# Altium PCB Fast_Servo.PCBDOC (part 1 of 11)
Units mm, origin at the board's own origin, x right, y up, seen from the top; angles counter-clockwise.
Board outline 162.48 x 100 mm, 6 copper layers (Top, GP1(GND), L3, L4, P3V3, Bot), stack 1.716 mm thick; 668 components, 491 nets, 2308 pads, 1133 vias.
Unrouted connection lines stored in the file: 2.
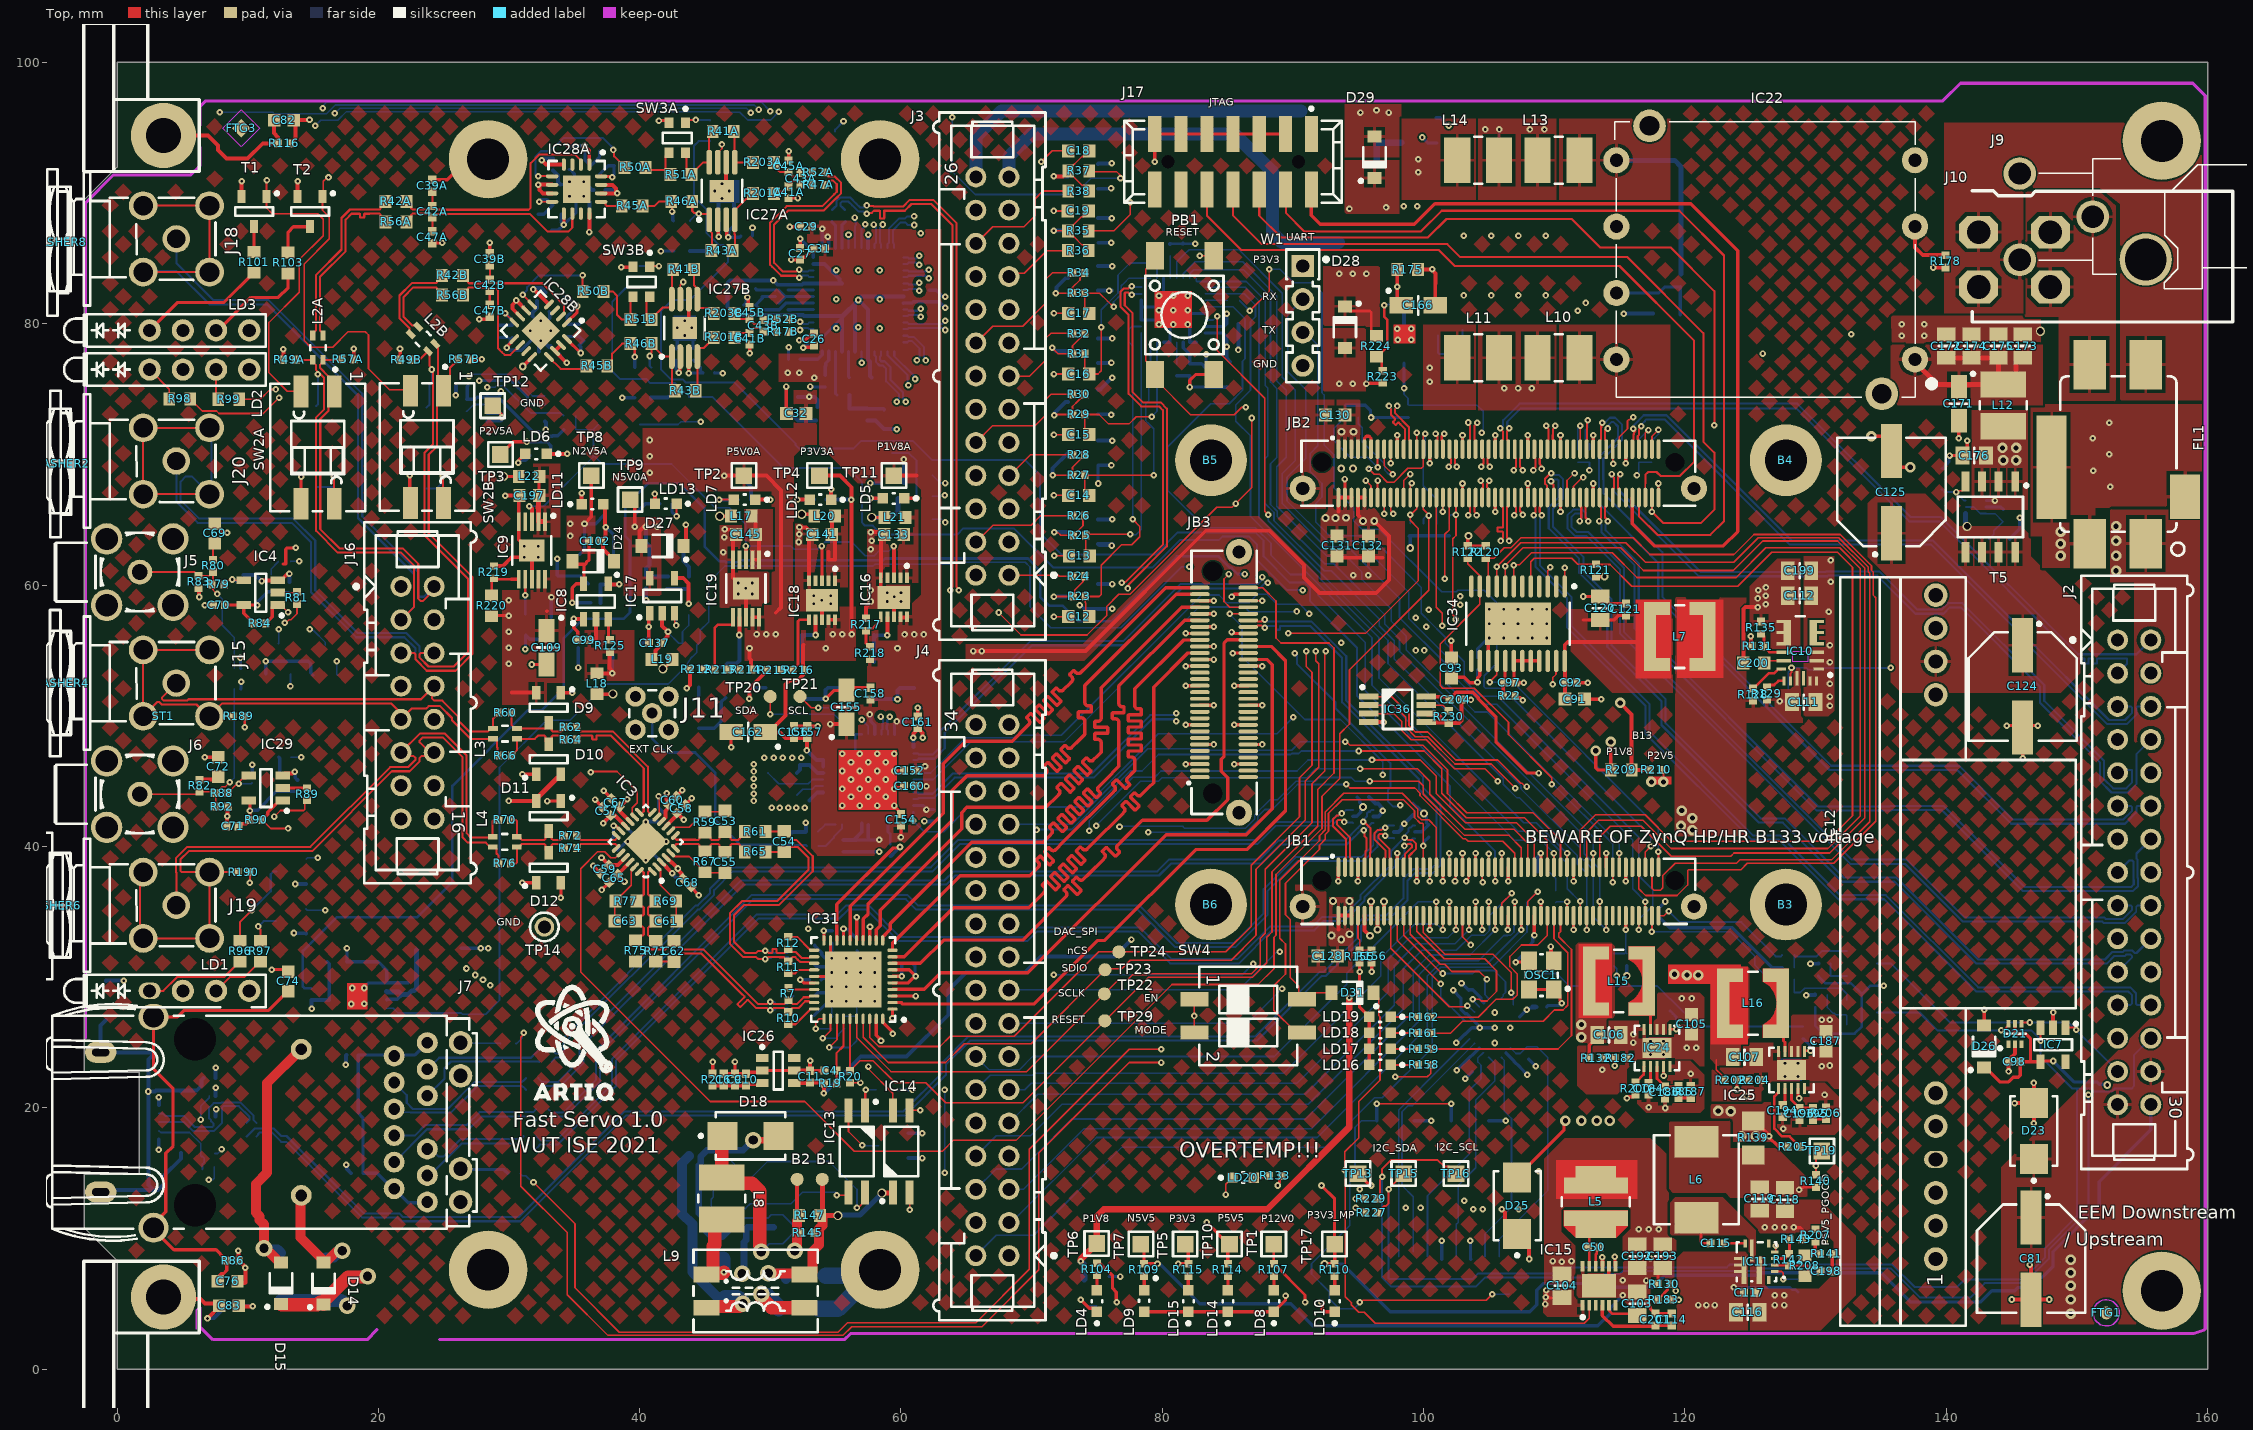
[diagram p0: Top view]
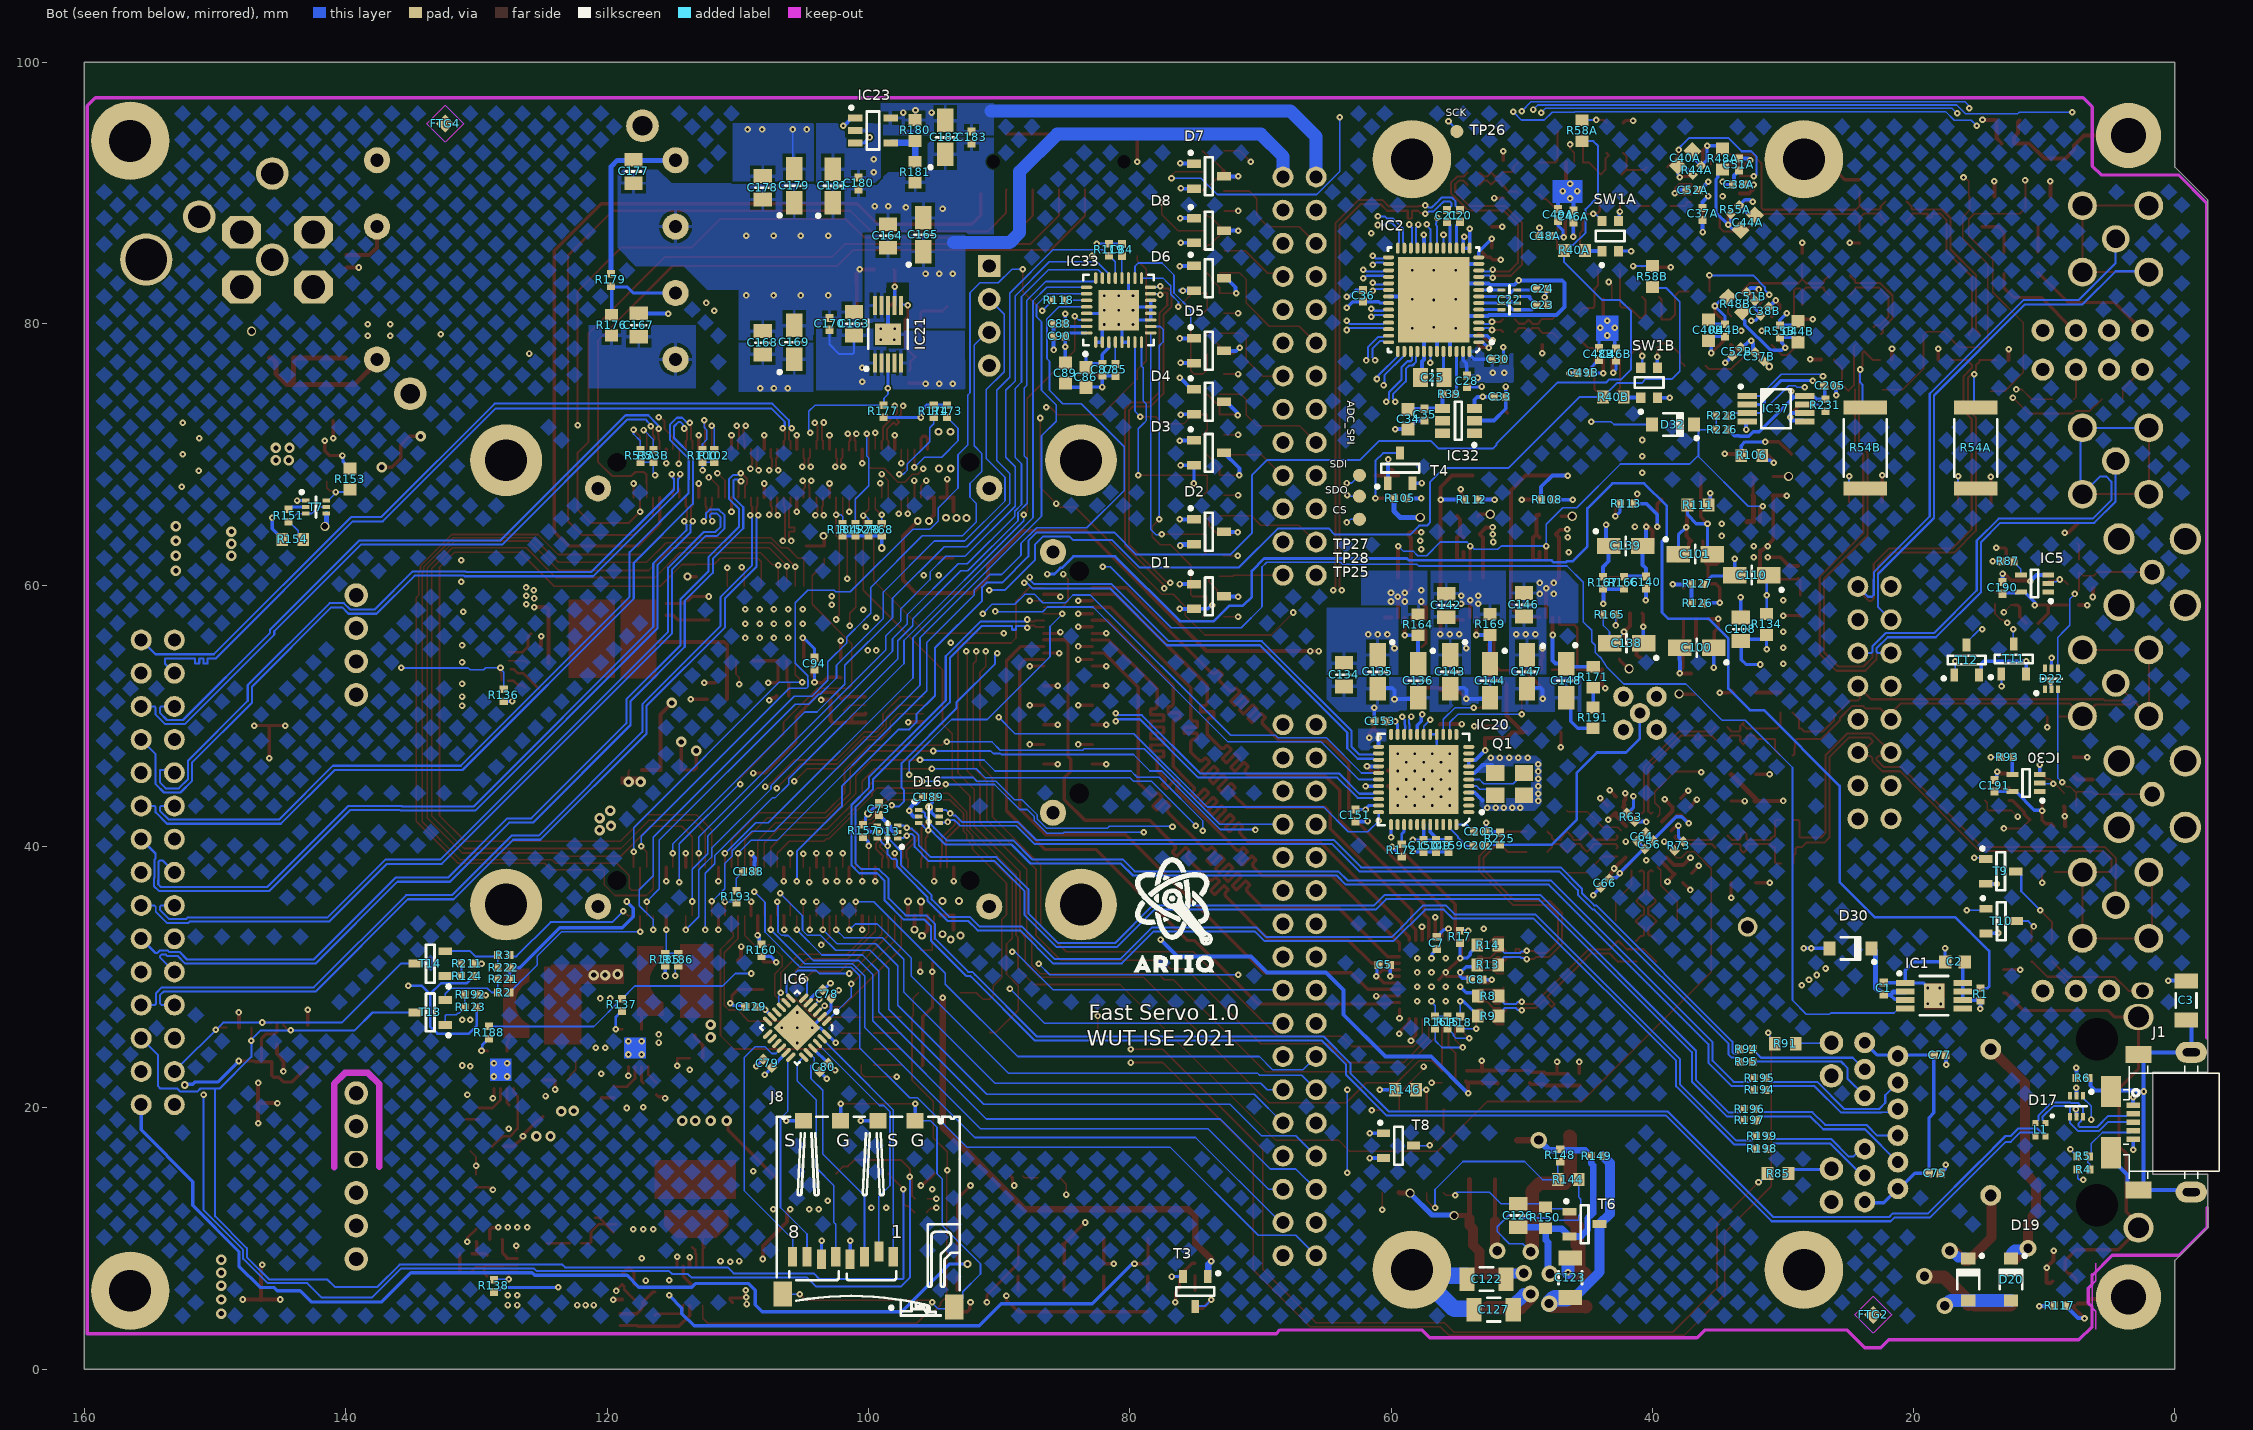
[diagram p1: Bot view, seen from below]
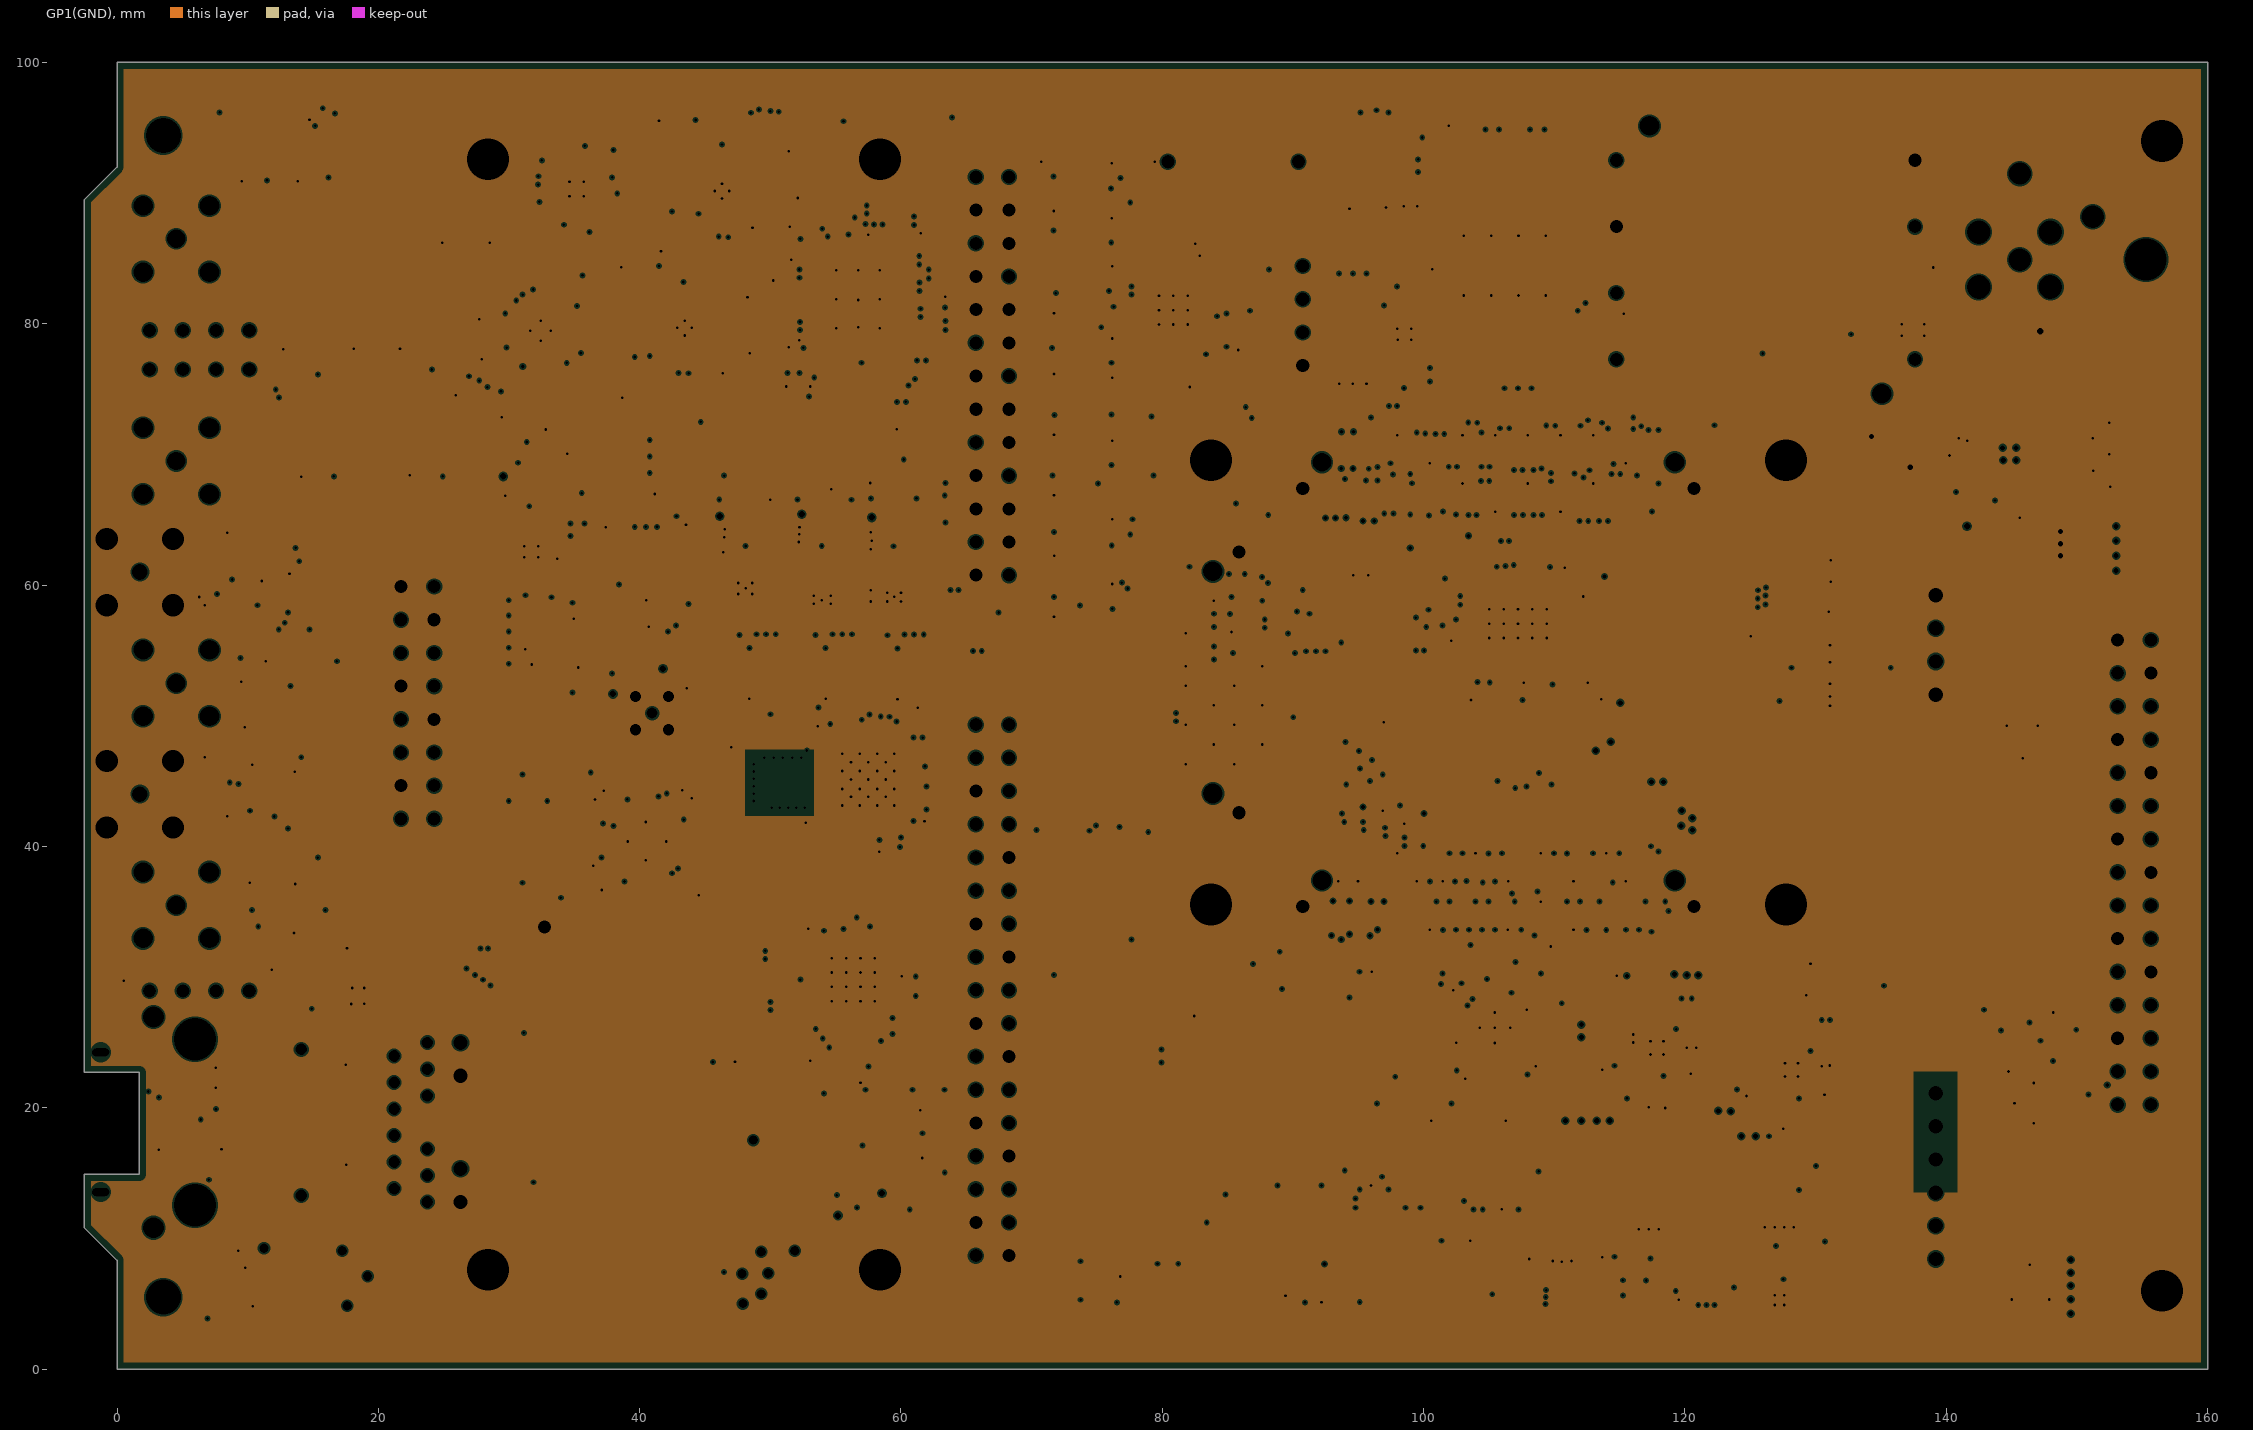
[diagram p2: GP1(GND), clearances drawn from the general rule]
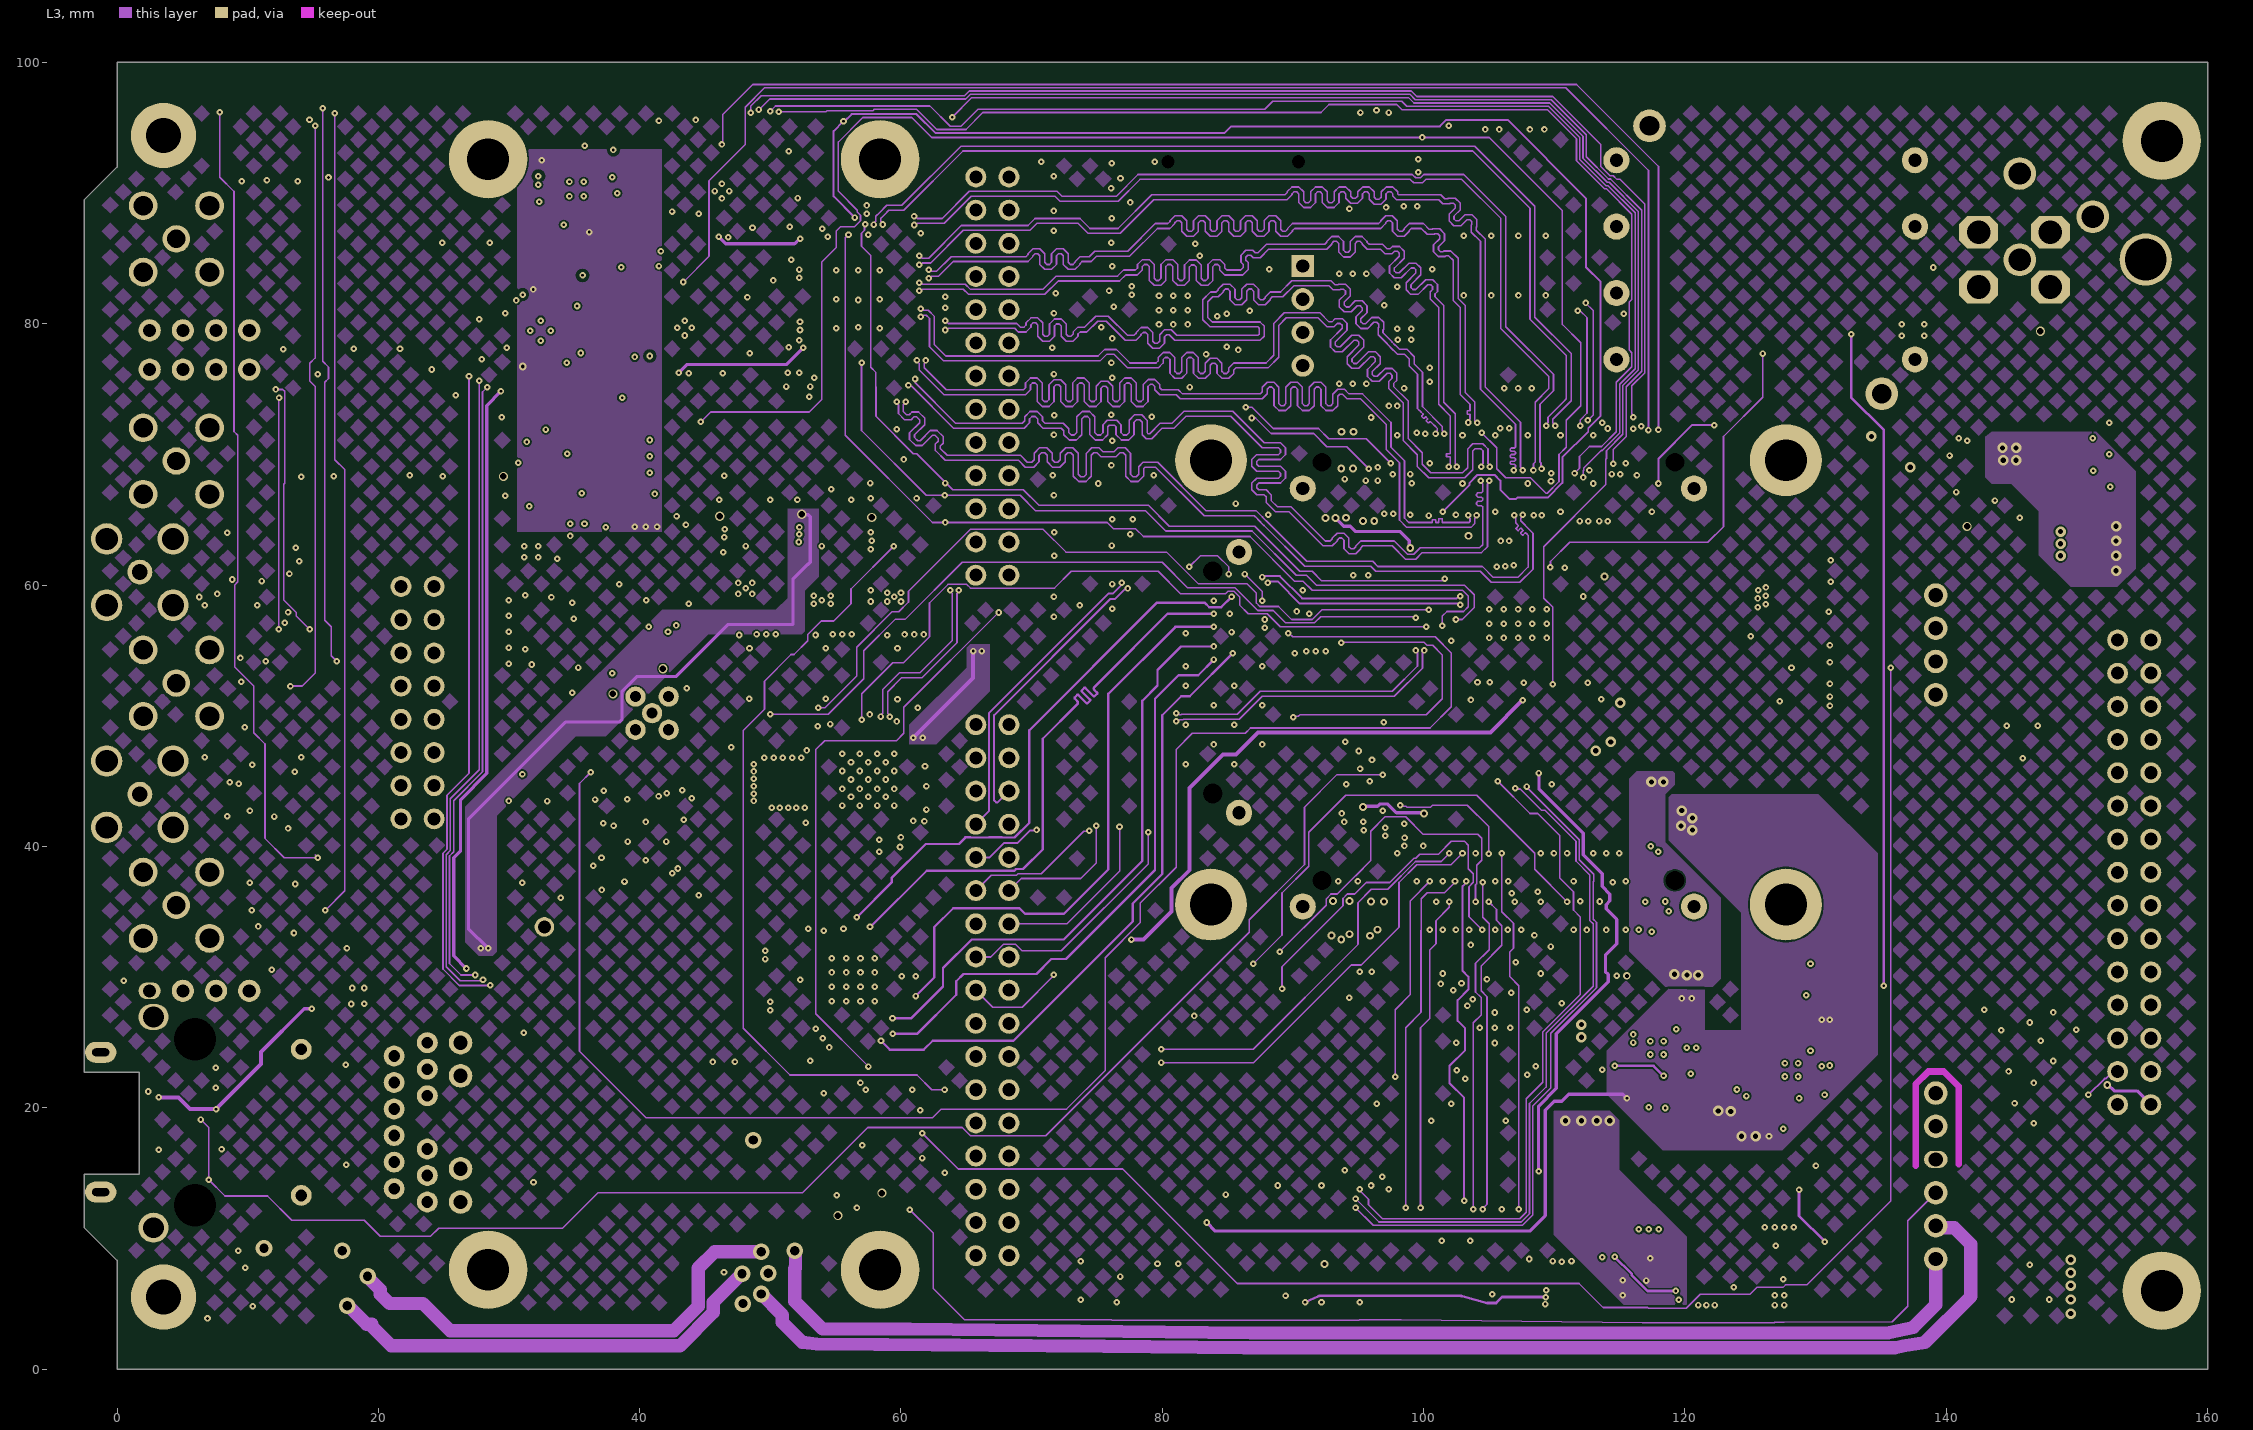
[diagram p3: L3]
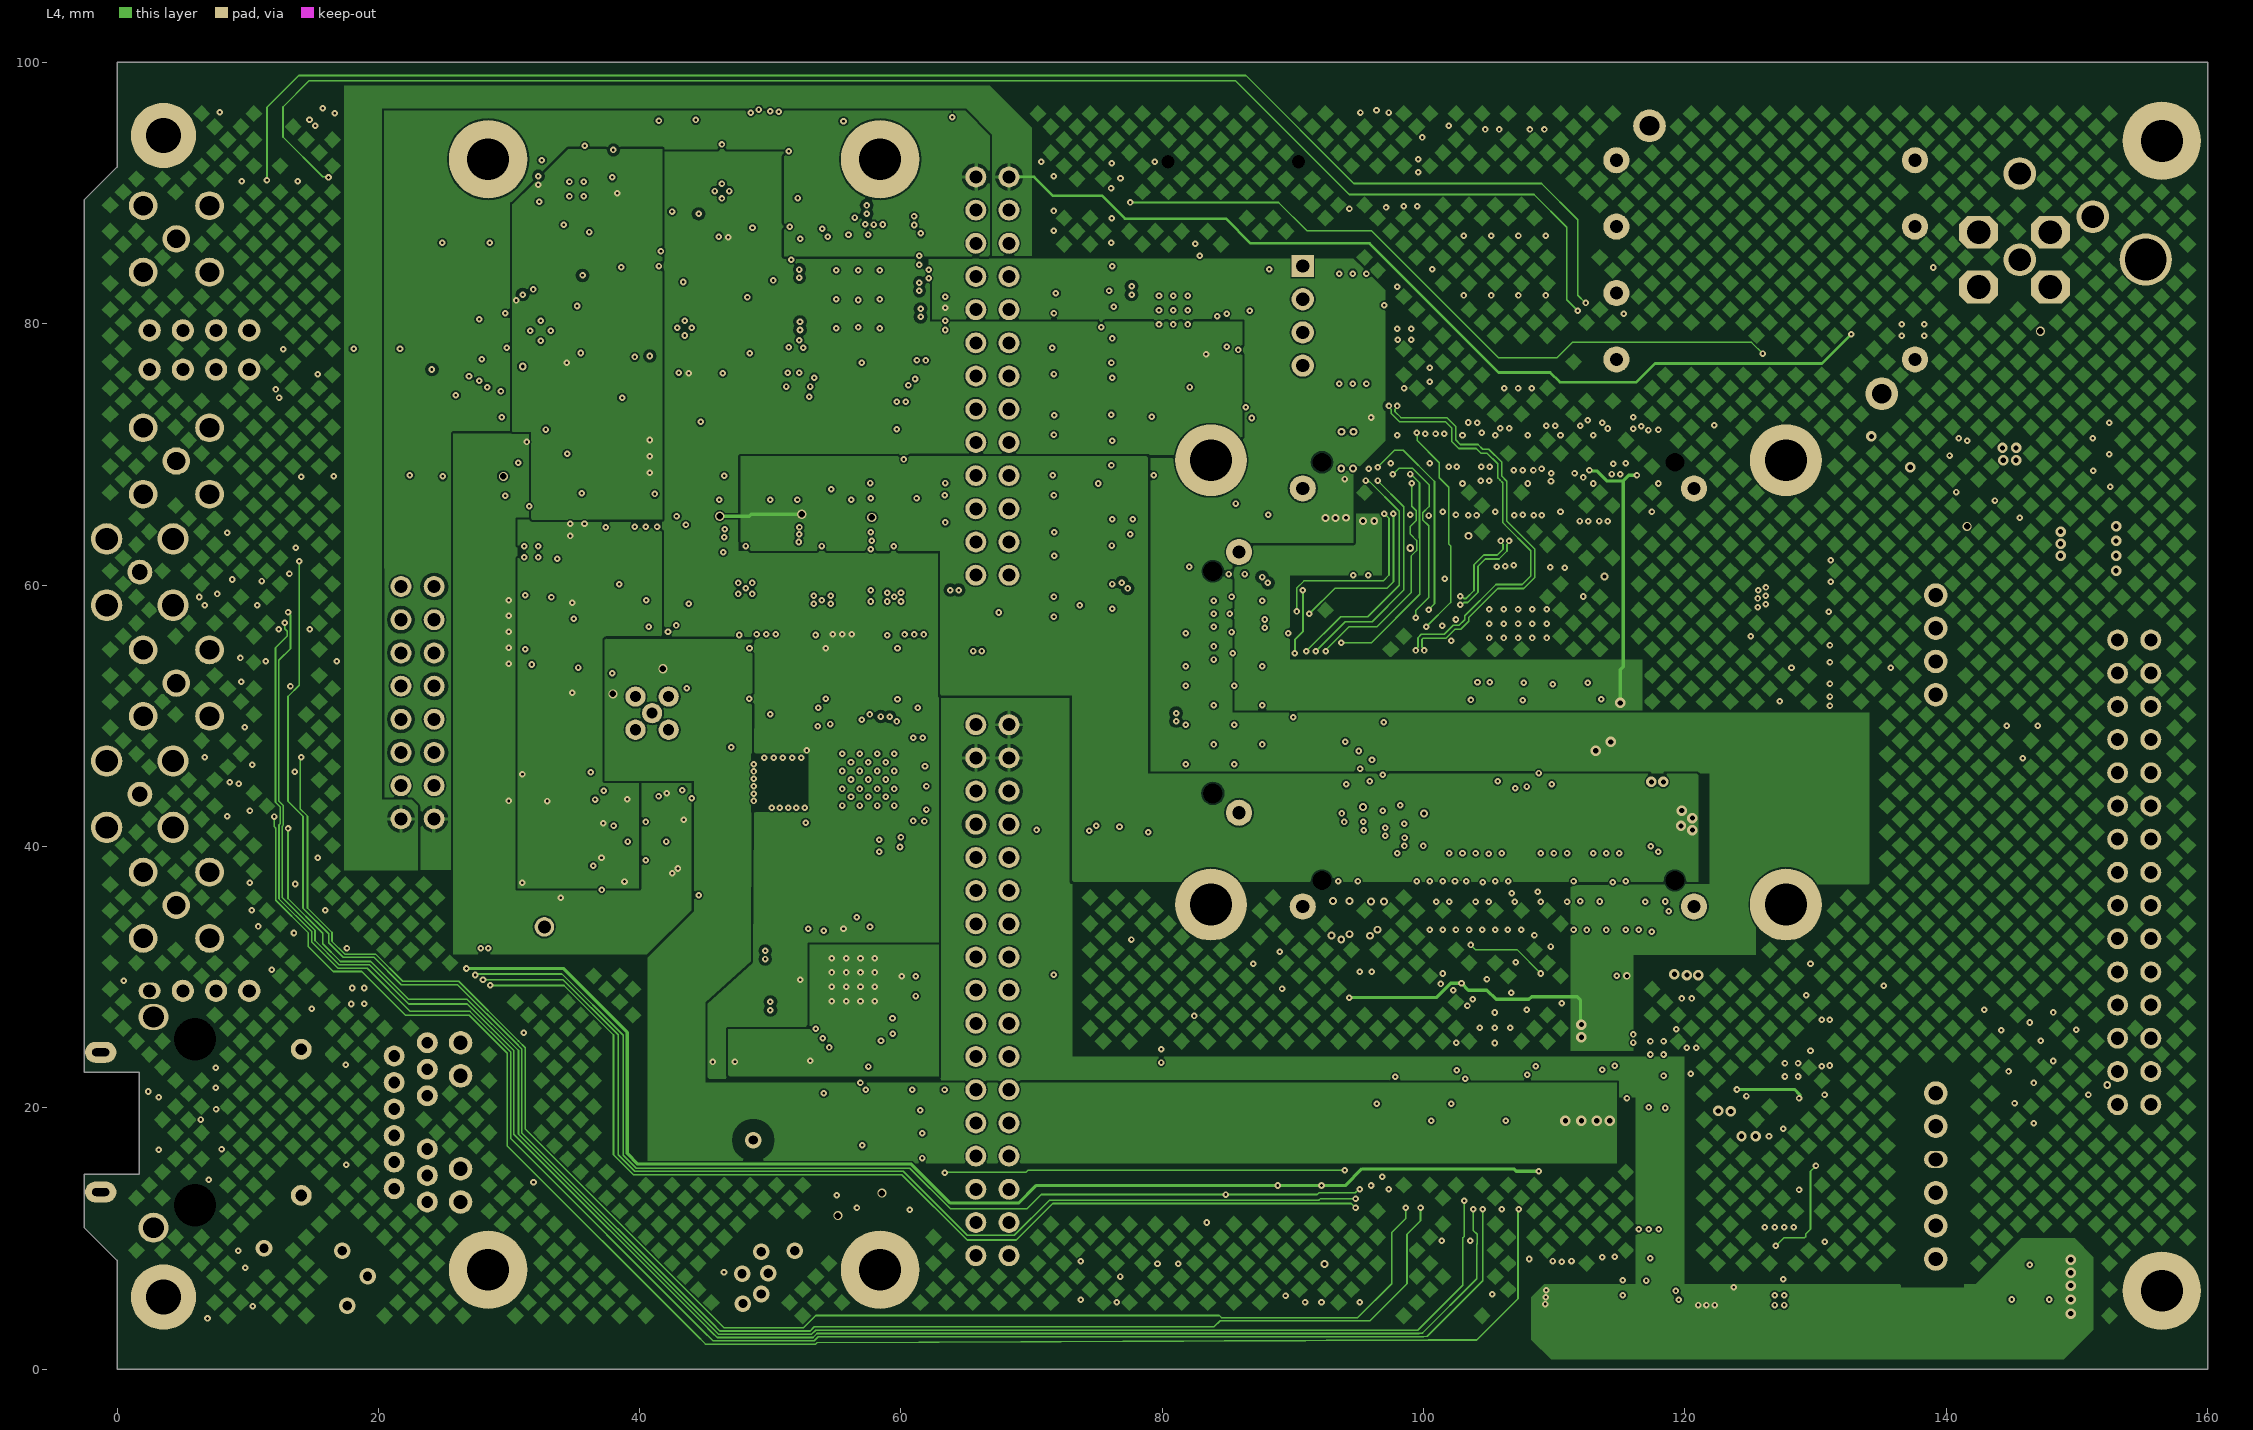
[diagram p4: L4]
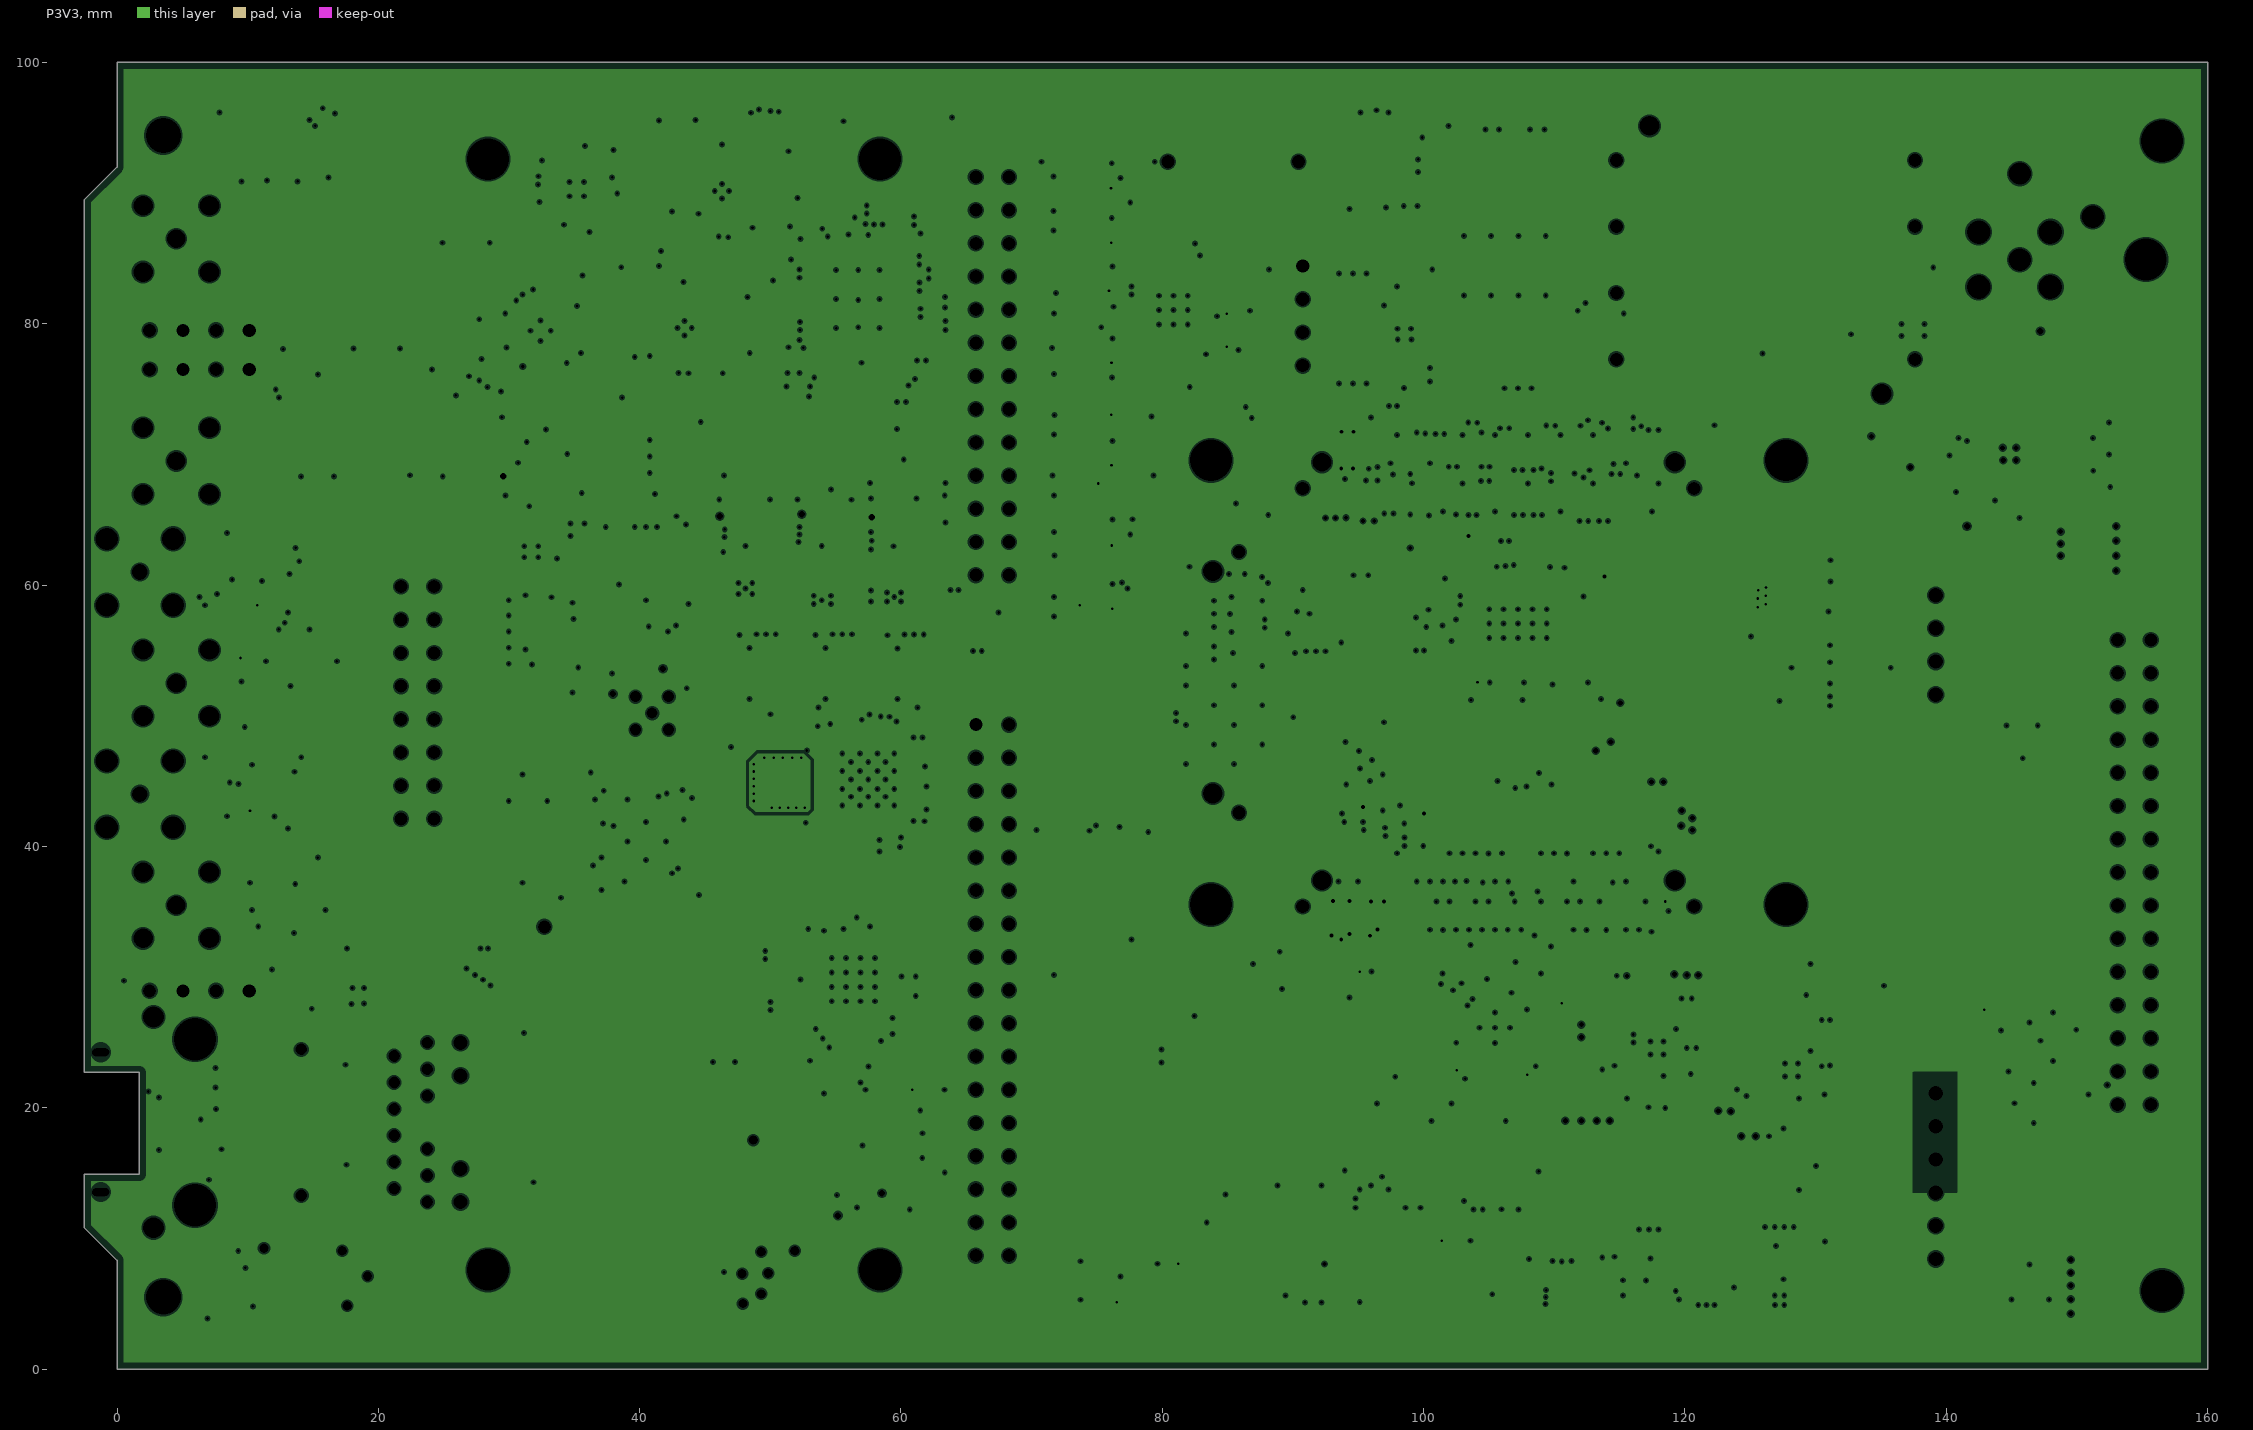
[diagram p5: P3V3, clearances drawn from the general rule]

## Layer stack, top to bottom
TopSolder: solder mask 0.01, Solder Resist, Dk 3.5
Top: signal copper 0.058
Dielectric1: prepreg 0.18, PP-006, Dk 4.1
GP1(GND): plane copper 0.035, net GND
Dielectric 3: core 0.46, Core-009, Dk 4.5
L3: signal copper 0.035
Dielectric 2: prepreg 0.18, PP-006, Dk 4.1
L4: signal copper 0.035
Dielectric 1: core 0.46, Core-009, Dk 4.5
P3V3: plane copper 0.035, net (Multiple Nets)
Dielectric2: prepreg 0.18, PP-006, Dk 4.1
Bot: signal copper 0.058
BottomSolder: solder mask 0.01, Solder Resist, Dk 3.5

## Board outline
-2.489,14.9 1.7,14.9 1.7,22.7 -2.489,22.7 -2.489,89.511 0,92 0,100 159.995,100 159.995,0 0,0 0,8.32 -2.489,10.809

## Design rules (kind name [scope] priority, off if disabled: settings)
AcuteAngle [All] p1: minimum=6.00000000000000E+0001 checktracksonly=FALSE
BoardOutlineClearance [All] p1 off: gap=0.4 ignorepadtopadclearanceinfootprint=FALSE
Clearance Clearance_HV [InNetClass('HV') vs (not InNetClass('HV'))] p1: gap=1 ignorepadtopadclearanceinfootprint=TRUE
Clearance Clearance_High_Speed [InNetClass('HIGH_SPEED') vs not InNetClass('HIGH_SPEED')] p2: gap=0.125 ignorepadtopadclearanceinfootprint=TRUE except(0.2: Arc-Arc Arc-Track Track-Track Fill-Hole Poly-Hole Region-Hole; 0.3: Arc-Poly Track-Poly)
Clearance Clearance_balancing [InNamedPolygon('balancing')            or InNamedPolygon('balancing_top')] p3: gap=0.3 ignorepadtopadclearanceinfootprint=FALSE
Clearance Clearance_DIFF [(InDifferentialPairClass('All Differential Pairs'))] p4: gap=0.127 ignorepadtopadclearanceinfootprint=TRUE except(0: Arc-Hole Track-Hole SMDPad-Hole THPad-Hole Via-Hole Fill-Hole Poly-Hole Region-Hole Text-Hole; 0.254: Arc-Poly Track-Poly SMDPad-Poly THPad-Poly Via-Poly Fill-Poly Poly-Poly Poly-Region Poly-Text)
Clearance Clearance_DIFF2 [IsDifferentialPair vs IsDifferentialPair] p5: gap=0.254 ignorepadtopadclearanceinfootprint=TRUE except(0: Arc-Hole Track-Hole SMDPad-Hole THPad-Hole Via-Hole Fill-Hole Poly-Hole Region-Hole Text-Hole; 0.127: Arc-SMDPad Arc-THPad Arc-Via Arc-Text Track-SMDPad Track-THPad Track-Via Track-Text SMDPad-SMDPad SMDPad-THPad SMDPad-Via SMDPad-Text THPad-THPad THPad-Via THPad-Text Via-Via Via-Text Text-Text; 0.3: Arc-Arc Arc-Track Track-Track)
Clearance Clearance_Poly [InPoly vs InPoly] p6: gap=0.125 ignorepadtopadclearanceinfootprint=TRUE except(0: Arc-Hole Track-Hole SMDPad-Hole THPad-Hole Via-Hole Fill-Hole Poly-Hole Region-Hole Text-Hole; 0.2: Fill-Fill Fill-Poly Fill-Region Poly-Poly Poly-Region Region-Region)
Clearance [All] p7: gap=0.125 ignorepadtopadclearanceinfootprint=TRUE except(0: Arc-Hole Track-Hole SMDPad-Hole THPad-Hole Via-Hole Fill-Hole Poly-Hole Region-Hole Text-Hole)
ComponentClearance [All] p1 off: gap=0.254 collisioncheckmode=3 verticalgap=0.254 showdistances=FALSE
DiffPairsRouting [All] p1: maxlimit=0.26 minlimit=0.15 mostfreqgap=0.254 toplayer_maxgap=0.16 toplayer_prefgap=0.15 toplayer_minwidth=0.152 toplayer_maxwidth=0.16 toplayer_prefwidth=0.152 midlayer1_mingap=0.24 midlayer1_minwidth=0.125 midlayer1_maxwidth=0.381 midlayer1_prefwidth=0.125 midlayer2_mingap=0.17 midlayer2_maxgap=0.2 midlayer2_prefgap=0.18 midlayer2_minwidth=0.125 midlayer2_maxwidth=0.13 midlayer2_prefwidth=0.125 bottomlayer_maxgap=0.16 bottomlayer_prefgap=0.15 bottomlayer_minwidth=0.152 bottomlayer_maxwidth=0.16 bottomlayer_prefwidth=0.152 impedanceprofiledriven=TRUE impedanceprofileid={14AB3F39-AB0A-4665-B2E5-9E1BC8C8DE81} impedanceprofilevalue=100.000000 maxuncoupledlength=50
FabricationTestPointUsage TestPointUsage [All] p1: valid=0 allowmultiple=FALSE
FabricationTestpoint Testpoint [All] p1: side=3 testpointundercomponent=TRUE minsize=1.016 maxsize=2.54 preferedsize=1.524 minholesize=0.508 maxholesize=1.016 preferedholesize=0.813 testpointgrid=0.025 allowsidetop=TRUE allowsidebottom=TRUE usegrid=TRUE gridtolerance=0
Height Height_1 [OnLayer('Bot')] p1: minheight=0 maxheight=2 prefheight=2
Height [All] p2 off: minheight=0 maxheight=25.4 prefheight=12.7
HoleSize [All] p1: absolutevalues=TRUE maxlimit=5 minlimit=0.2 maxpercent=80.000 minpercent=20.000
HoleToHoleClearance [All] p1: gap=0.15 allowstackedmicrovias=FALSE
MatchedLengths MatchedLengthsADC [InDifferentialPairClass('ADC')] p1: tolerance=10 checknetsindiffpair=FALSE checkdiffpairvsdiffpair=TRUE checkxsignals=TRUE checkothers=TRUE
MatchedLengths MatchedLengthsWithinDiffPair [InDifferentialPairClass('All Differential Pairs')] p2 off: tolerance=2 checknetsindiffpair=TRUE checkdiffpairvsdiffpair=FALSE checkxsignals=FALSE checkothers=FALSE
MinimumAnnularRing [All] p1: minimumring=0.1
MinimumSolderMaskSliver [All] p1: minsoldermaskwidth=0.003
ParallelSegment [InNetClass('HIGH_SPEED') vs InNetClass('HIGH_SPEED')] p1 off: limit=1 gap=0.2
PlaneClearance PlaneClearance_HV [InNetClass('HV')] p1: clearance=1
PlaneClearance [All] p2: clearance=0.125
PlaneConnect [All] p1: pad.planeconnectstyle=Relief pad.reliefexpansion=0.254 pad.reliefentries=4 pad.reliefconductorwidth=0.127 pad.reliefairgap=0.127 via.planeconnectstyle=Direct via.reliefexpansion=0.508 via.reliefentries=4 via.reliefconductorwidth=0.254 via.reliefairgap=0.254
PolygonConnect PolygonConnect_N5V5 [InComponentClass('N5V5')] p1: connectstyle=Direct reliefconductorwidth=0.254 reliefentries=4 polygonreliefangle="90 Angle" airgapwidth=0.254
PolygonConnect PolygonConnect_P3V3 [InComponentClass('P3V3')] p2: connectstyle=Direct reliefconductorwidth=0.254 reliefentries=4 polygonreliefangle="90 Angle" airgapwidth=0.254
PolygonConnect PolygonConnect_P1V8 [InComponentClass('P1V8')] p3: connectstyle=Direct reliefconductorwidth=0.254 reliefentries=4 polygonreliefangle="90 Angle" airgapwidth=0.254
PolygonConnect PolygonConnect_P5V5 [InComponentClass('P5V5')] p4: connectstyle=Direct reliefconductorwidth=0.254 reliefentries=4 polygonreliefangle="90 Angle" airgapwidth=0.254
PolygonConnect PolygonConnect_Inductor [HasFootprint('FP-IHLP-3232DZ-FP_2_413x5-MFG')] p5: connectstyle=Direct reliefconductorwidth=0.254 reliefentries=4 polygonreliefangle="90 Angle" airgapwidth=0.254
PolygonConnect PolygonConnect_P2V5SW [InNet('P2V5SW')] p6: connectstyle=Direct reliefconductorwidth=0.254 reliefentries=4 polygonreliefangle="90 Angle" airgapwidth=0.254
PolygonConnect PolygonConnect_BGA_N5V5 [HasFootprint('LT-BGA-35-11250X6250X3420')] p7: connectstyle=Direct reliefconductorwidth=0.254 reliefentries=4 polygonreliefangle="90 Angle" airgapwidth=0.254
PolygonConnect PolygonConnect_CBST [InNet('NetC63_1')] p8: connectstyle=Direct reliefconductorwidth=0.254 reliefentries=4 polygonreliefangle="90 Angle" airgapwidth=0.254
PolygonConnect PolygonConnect_P12V [HasFootprint('FP-RPA0010A-MFG') or InComponent('C103')] p9: connectstyle=Direct reliefconductorwidth=0.254 reliefentries=4 polygonreliefangle="90 Angle" airgapwidth=0.254
PolygonConnect PolygonConnect_XTAL [InNet('XTAL_GND')] p10: connectstyle=Direct reliefconductorwidth=0.254 reliefentries=4 polygonreliefangle="90 Angle" airgapwidth=0.254
PolygonConnect PolygonConnect_pad [(InPadClass('All Pads'))] p11: connectstyle=Relief reliefconductorwidth=0.254 reliefentries=4 polygonreliefangle="90 Angle" airgapwidth=0.254
PolygonConnect [All] p12: connectstyle=Direct reliefconductorwidth=0.254 reliefentries=4 polygonreliefangle="45 Angle" airgapwidth=0.254
RoomDefinition U_LEDS [InComponentClass('U_LEDS')] p1 off: confinementstyle=ConfineIn formatcopy=TRUE lockcomponents=FALSE outline 11.45,1.067 28.296,1.067 28.296,-0.8 11.45,-0.8
RoutingVias "Schematic Routing Via Style_2" [InNetClass('Hpower')] p1: holewidth=0.5 width=0.7 viastyle="Through Hole" minholewidth=0.5 minwidth=0.7 maxholewidth=0.711 maxwidth=1.27
RoutingVias [All] p2: holewidth=0.2 width=0.5 viastyle="Through Hole" minholewidth=0.2 minwidth=0.4 maxholewidth=0.711 maxwidth=1.27 useviatemplates=TRUE viatemplateguid#1={9CB9EA88-00DB-47E4-B7D2-4D89F794AFCA} viatemplateguid#2={3F6BD617-2806-4351-933B-12AA6CC8260C} viatemplateguid#3={FB98114A-989F-4F94-8032-29B93ABFB1F8} viatemplateguid#4={000CEFEB-2735-4691-BB6D-4BB148AF8406} viatemplateguid#5={FDC81755-E35E-46B0-BF83-CC126CBA6DBC} viatemplatename#1=v50h20m0mx0 viatemplatename#2=v60h30m0mx0 viatemplatename#3=v70h50m0mx0 viatemplatename#4=v80h40m0mx0 viatemplatename#5=v127h71m0mx0
SilkToSilkClearance [All] p1: silktosilkclearance=0.051
SilkToSolderMaskClearance SilkscreenOverComponentPads [IsPad] p1: minsilkscreentomaskgap=0.051 clearancetoexposedcopper=TRUE
SolderMaskExpansion [All] p1: expansion=0.051 istentingtop=FALSE
ViasUnderSMD ViasUnderSMD_allow [HasFootprint('SON50P300X80_HS-11N')  or HasFootprint('LT-MS8E-8-EDP_M')  or   HasFootprint('SOP65P490X110-9N-R157X189')  or   HasFootprint('SON50P300X300X80-11N-R175X248')  or      HasFootprint('SOP50P490X110-11N-R168X198')  or     HasFootprint('QFN50P400X400X80-25N-S240')  or     HasFootprint('SOP50P490X110-11N-R168X198')  or   HasFootprint('QFN50P400X400X80-25N-S255')  or HasFootprint('QFN50P700X700X90-45N-S530')  or    HasFootprint('CP-16-4_N')  or     HasFootprint('RE-24_N')  or     HasFootprint('CP-40-1_N')  or     HasFootprint('CP-32-2_N')  or     HasFootprint('QFN50P700X800X80-53N-R655X550')] p1: allowed=TRUE
ViasUnderSMD [All] p2: allowed=FALSE
Width "Schematic Width Constraint_1" [InNetClass('Hpower')] p1: maxlimit=1.27 minlimit=0.381 preferedwidth=0.508
Width Z50R [InNetClass('SE50')] p2: maxlimit=0.26 minlimit=0.18 preferedwidth=0.26 toplayer_minwidth=0.26 midlayer1_maxwidth=0.18 midlayer1_prefwidth=0.18 midlayer2_minwidth=0.195 midlayer2_maxwidth=0.195 midlayer2_prefwidth=0.195 bottomlayer_minwidth=0.26 impedanceprofiledriven=TRUE impedanceprofileid={0EAE177B-5537-4F3A-BB17-587E98DE51B5} impedanceprofilevalue=50.000000 minimp=50.000000 maximp=50.000000 favimp=50.000000
Width Standard [All] p3: maxlimit=1.27 minlimit=0.125 preferedwidth=0.125 minimp=50.000000 maximp=50.000000 favimp=50.000000
18 further rules are at their usual default settings.

## Classes and differential pairs
pad class GND: IC2-53 IC3-25 IC6-25 IC9-11 IC10-39 IC16-11 IC18-11 IC19-11 IC20-45 IC21-11 IC24-11 U1-41 U4A-17 U4B-17 U5A-17 U5B-17 U6-33 U7-25
component class U_CON_JTAG_UART: J17 W1
component class PWR_P12V0A_N12V0A: B1 B2 C122 C123 C124 C125 C126 C127 C163 C164 C165 C166 C167 C168 C169 C170 C171 C172 C173 C174 C175 C176 C177 C178 C179 C180 C181 C182 C183 D28 D29 D32 IC12 IC13 IC14 IC21 IC22 IC23 L8 L9 L10 L11 L12 L13 L14 R144 R145 R146 R147 R148 R149 R150 R151 R152 R153 R154 R175 R176 R177 R178 R179 R180 R181 R223 R224 T5 T6 T7 T8
component class U_CON_MEZZANINE_ADC_DAC: J16
component class U_CLK_GEN: C149 C150 C151 C152 C153 C154 C155 C156 C157 C158 C159 C160 C161 C162 C202 C203 IC20 J11 Q1 R172 R173 R174 R225 TP20 TP21
differential pair class DIFF100: IOUT
net class SE50: DAC_DATA0 DAC_DATA1 DAC_DATA2 DAC_DATA3 DAC_DATA4 DAC_DATA5 DAC_DATA6 DAC_DATA7 DAC_DATA8 DAC_DATA9 DAC_DATA10 DAC_DATA11 DAC_DATA12 DAC_DATA13 DAC_DCLKIO
net class HIGH_SPEED: DAC_CLKIN DAC_DATA0 DAC_DATA1 DAC_DATA2 DAC_DATA3 DAC_DATA4 DAC_DATA5 DAC_DATA6 DAC_DATA7 DAC_DATA8 DAC_DATA9 DAC_DATA10 DAC_DATA11 DAC_DATA12 DAC_DATA13 DAC_DCLKIO OTG-D_N OTG-D_P OTG-ID OUT1A_N OUT1A_P OUT1B_N OUT1B_P OUT1C_N OUT1C_P OUT1D_N OUT1D_P OUT2A_N OUT2A_P OUT2B_N OUT2B_P OUT2C_N OUT2C_P OUT2D_N OUT2D_P PHY_MDI0_N PHY_MDI0_P PHY_MDI1_N PHY_MDI1_P PHY_MDI2_N PHY_MDI2_P PHY_MDI3_N PHY_MDI3_P USB-VBUS VBUS_V_EN
component class U_DAC_AFE: C53 C54 C55 C56 C57 C58 C59 C60 C61 C62 C63 C64 C65 C66 C67 C68 D9 D10 D11 D12 IC3 L3 L4 R59 R60 R61 R62 R63 R64 R65 R66 R67 R68 R69 R70 R71 R72 R73 R74 R75 R76 R77 R78
channel class ADC_AFE: "Channel 1" "Channel 2"
net class DAC_DATA[0..13]: DAC_DATA0 DAC_DATA1 DAC_DATA2 DAC_DATA3 DAC_DATA4 DAC_DATA5 DAC_DATA6 DAC_DATA7 DAC_DATA8 DAC_DATA9 DAC_DATA10 DAC_DATA11 DAC_DATA12 DAC_DATA13
component class U_USB: C1 C2 C3 D17 D30 IC1 J1 L1 R1 R4 R5 R6
component class POWER_SUPPLY: C81 D23 FL1 J9 J10 LD4 LD5 LD6 LD7 LD8 LD9 LD10 LD11 LD12 LD13 LD14 LD15 R104 R105 R106 R107 R108 R109 R110 R111 R112 R113 R114 R115 T3 T4 TP1 TP2 TP3 TP4 TP5 TP6 TP7 TP8 TP9 TP10 TP11 TP12 TP13 TP14
component class U_SOM_JB3: JB3
component class U_SoM_JB2: C130 C131 C132 JB2 PB1 R209 R210
component class U_SOM_JB1: C128 C129 C188 D31 JB1 LD16 LD17 LD18 LD19 OSC1 R2 R3 R155 R156 R157 R158 R159 R160 R161 R162 R185 R186 R193 SW4
component class U_SD_CARD: C78 C79 C80 IC6 J8
component class U_PWR_SMPS: C50 C103 C104 C105 C106 C107 C111 C112 C114 C115 C116 C117 C118 C119 C120 C121 C184 C185 C186 C187 C192 C193 C194 C195 C196 C198 C199 C200 C201 D25 D26 IC10 IC11 IC15 IC24 IC25 L5 L6 L7 L15 L16 R128 R129 R130 R131 R132 R135 R136 R137 R138 R139 R140 R141 R142 R143 R182 R183 R187 R188 R200 R202 R204 R205 R206 R207 R208 TP19
component class U_PWR_LDOs: C99 C100 C101 C102 C108 C109 C110 C133 C134 C135 C136 C137 C138 C139 C140 C141 C142 C143 C144 C145 C146 C147 C148 C197 D24 D27 IC8 IC9 IC16 IC17 IC18 IC19 L17 L18 L19 L20 L21 L22 R125 R126 R127 R134 R164 R165 R166 R167 R169 R171 R191 R212 R213 R214 R215 R216 R217 R218 R219 R220
component class U_LEDs: LD1 LD2 LD3 R96 R97 R98 R99 R100 R101 R102 R103 T1 T2 T9 T10 T11 T12
component class U_EEPROM_sensors: C98 C204 C205 D21 IC7 IC36 IC37 LD20 R123 R124 R133 R192 R211 R221 R222 R226 R227 R228 R229 R230 R231 T13 T14 TP15 TP16 TP17
component class "EEM Connector": J2
component class U_DIGITAL_IOs: C69 C70 C71 C72 C190 C191 D22 IC4 IC5 IC29 IC30 J5 J6 R79 R80 R81 R82 R83 R84 R87 R88 R89 R90 R92 R93
component class U_DAC: C4 C5 C6 C7 C8 C9 C10 C11 IC26 IC31 R7 R8 R9 R10 R11 R12 R13 R14 R15 R16 R17 R18 R19 R20 R21 TP22 TP23 TP24 TP29 U2
component class U_DAC_AUX: C91 C92 C93 C94 C97 IC34 R22 R120 R121 R122
component class U_ADC: C20 C21 C22 C23 C24 C25 C26 C27 C28 C29 C30 C31 C32 C33 C34 C35 C36 IC2 IC32 R39 R184 TP25 TP26 TP27 TP28
component class TOP: B3 B4 B5 B6 C82 C83 FTG1 FTG2 FTG3 FTG4 J15 J18 J19 J20 R116 R117 R189 R190 ST1 WASHER2 WASHER4 WASHER6 WASHER8
component class "Channel 2": C37B C38B C39B C40B C41B C42B C43B C44B C45B C46B C47B C48B C49B C51B C52B IC27B IC28B L2B R40B R41B R42B R43B R44B R45B R46B R47B R48B R49B R50B R51B R52B R53B R54B R55B R56B R57B R58B R201B R203B SW1B SW2B SW3B
component class "Channel 1": C37A C38A C39A C40A C41A C42A C43A C44A C45A C46A C47A C48A C49A C51A C52A IC27A IC28A L2A R40A R41A R42A R43A R44A R45A R46A R47A R48A R49A R50A R51A R52A R53A R54A R55A R56A R57A R58A R201A R203A SW1A SW2A SW3A
net class HV: NetB1_1 NetB2_1 NetC123_1 NetC123_2 NetC126_2 NetC127_2 NetIC12_3 NetIC13_4 POE_IN1 POE_IN2 POE_VC+ POE_VC-
net class Lpower: JTAG.JTAG_REF N2V5A N5V0A N5V5 N12V0A NetC50_1 NetC115_1 NetIC24_4 NetIC25_4 P1V8 P1V8A P2V5 P2V5A P3V3 P3V3_MP P3V3_SOM_OUT P3V3A P5V0A P5V5A P5V5SW P12V0A
net class Hpower: GNDF N13V0S NetB1_1 NetC127_2 P12V0F P12V0FIL P12V0POE P13V0S
component class U_CON_MEZZANINE_ANALOG: C12 C13 C14 C15 C16 C17 C18 C19 D1 D2 D3 D4 D5 D6 D7 D8 J3 R23 R24 R25 R26 R27 R28 R29 R30 R31 R32 R33 R34 R35 R36 R37 R38
component class U_ETH_CON: C73 C74 C75 C76 C77 C189 D13 D14 D15 D16 D18 D19 D20 J7 R85 R86 R91 R94 R95 R194 R195 R196 R197 R198 R199
component class U_ADC_AUX: C84 C85 C86 C87 C88 C89 C90 IC33 R118 R119
component class CON_MEZZANINE_GPIO: J4
differential pair AFE_OUTB: +AFE_OUTB_P -AFE_OUTB_N
differential pair AFE_OUTA: +AFE_OUTA_P -AFE_OUTA_N
differential pair ADC_AFE_IN_RB: +ADC_AFE_IN_RB_P -ADC_AFE_IN_RB_N
differential pair ADC_AFE_IN_RA: +ADC_AFE_IN_RA_P -ADC_AFE_IN_RA_N
differential pair ADC_AFE_IN_R2B: +ADC_AFE_IN_R2B_P -ADC_AFE_IN_R2B_N
differential pair ADC_AFE_IN_R2A: +ADC_AFE_IN_R2A_P -ADC_AFE_IN_R2A_N
differential pair OTG-D_L: +OTG-D_L_P -OTG-D_L_N
differential pair FPGA_CLK1.CLK: +FPGA_CLK1.CLK_P -FPGA_CLK1.CLK_N
differential pair ADC_CTRL.FR: +ADC_CTRL.FR_P -ADC_CTRL.FR_N
differential pair ADC_CTRL.DCO: +ADC_CTRL.DCO_P -ADC_CTRL.DCO_N
differential pair ADC_AUX: +ADC_AUX_P -ADC_AUX_N
differential pair PHY_MDI1: +PHY_MDI1_P -PHY_MDI1_N
differential pair PHY_MDI0: +PHY_MDI0_P -PHY_MDI0_N
differential pair DAC_1: +DAC_1_P -DAC_1_N
differential pair DAC_0: +DAC_0_P -DAC_0_N
differential pair ADC_1: +ADC_1_P -ADC_1_N
differential pair ADC_0: +ADC_0_P -ADC_0_N
differential pair CLK2: +CLK2_P -CLK2_N
differential pair OTG-D: +OTG-D_P -OTG-D_N
differential pair CH2_DAC_OUT: +CH2_DAC_OUT_P -CH2_DAC_OUT_N
differential pair CH2_DAC_OUT_D: +CH2_DAC_OUT_D_P -CH2_DAC_OUT_D_N
differential pair CH2_DAC_IN_R: +CH2_DAC_IN_R_P -CH2_DAC_IN_R_N
differential pair CH1_DAC_OUT: +CH1_DAC_OUT_P -CH1_DAC_OUT_N
differential pair CH1_DAC_OUT_D: +CH1_DAC_OUT_D_P -CH1_DAC_OUT_D_N
differential pair ADC_AFE_INB: +ADC_AFE_INB_P -ADC_AFE_INB_N
differential pair ADC_AFE_INA: +ADC_AFE_INA_P -ADC_AFE_INA_N
differential pair ADC_AFE_IN_LB: +ADC_AFE_IN_LB_P -ADC_AFE_IN_LB_N
differential pair ADC_AFE_IN_LA: +ADC_AFE_IN_LA_P -ADC_AFE_IN_LA_N
differential pair CH1_DAC_IN_R: +CH1_DAC_IN_R_P -CH1_DAC_IN_R_N
differential pair ADC_CH2.SIG: +ADC_CH2.SIG_P -ADC_CH2.SIG_N
differential pair ADC_CH1.SIG: +ADC_CH1.SIG_P -ADC_CH1.SIG_N
differential pair QOUT: +QOUT_P -QOUT_N
differential pair PHY_MDI3: +PHY_MDI3_P -PHY_MDI3_N
differential pair PHY_MDI2: +PHY_MDI2_P -PHY_MDI2_N
differential pair OUT2D: +OUT2D_P -OUT2D_N
differential pair OUT2C: +OUT2C_P -OUT2C_N
differential pair OUT2B: +OUT2B_P -OUT2B_N
differential pair OUT2A: +OUT2A_P -OUT2A_N
differential pair OUT1D: +OUT1D_P -OUT1D_N
differential pair OUT1C: +OUT1C_P -OUT1C_N
differential pair OUT1B: +OUT1B_P -OUT1B_N
differential pair OUT1A: +OUT1A_P -OUT1A_N
differential pair IOUT: +IOUT_P -IOUT_N
differential pair ENC: +ENC_P -ENC_N
differential pair LVDS7: +LVDS7_P -LVDS7_N
differential pair LVDS6: +LVDS6_P -LVDS6_N
differential pair LVDS5: +LVDS5_P -LVDS5_N
differential pair LVDS4: +LVDS4_P -LVDS4_N
differential pair LVDS3: +LVDS3_P -LVDS3_N
differential pair LVDS2: +LVDS2_P -LVDS2_N
differential pair LVDS1: +LVDS1_P -LVDS1_N
differential pair LVDS0: +LVDS0_P -LVDS0_N

## Components (designator, comment, footprint, x,y, rotation, side; value= is the part's Value field where it differs from the comment)
B1 "SMD Pad" C100 53.976,14.525 r0 top locked
B2 "SMD Pad" C100 52.056,14.525 r0 top locked
B3 "Plated Hole" MTG320_550 127.725,35.554 r0 top locked
B4 "Plated Hole" MTG320_550 127.725,69.554 r0 top locked
B5 "Plated Hole" MTG320_550 83.725,69.554 r0 top locked
B6 "Plated Hole" MTG320_550 83.725,35.554 r0 top locked
C1 "100nF" CAPC1005X55N 22.293,29.131 r270 bottom locked
C2 "4.7uF" CAPC1709X95N 16.843,31.171 r180 bottom locked
C3 "100pF" CAPC3216X180N -0.85,28.211 r90 bottom
C4 "100nF" CAPC1005X55N 54.601,22.845 r0 top locked
C5 "1uF" CAPC1005X55N 60.521,30.93 r0 bottom locked
C6 "1uF" CAPC1005X55N 46.437,22.155 r270 top
C7 "100nF" CAPC1005X55N 56.5,32.61 r90 bottom
C8 "100nF" CAPC1005X55N 53.451,29.805 r180 bottom locked
C9 "100nF" CAPC1005X55N 47.294,22.155 r270 top
C10 "100nF" CAPC1005X55N 48.151,22.155 r270 top
C11 "100nF" CAPC1005X55N 53.026,22.38 r270 top locked
C12 "82pF" CAPC1608X87N 73.602,57.584 r0 top locked
C13 "82pF" CAPC1608X87N 73.659,62.234 r0 top locked
C14 "82pF" CAPC1608X87N 73.602,66.871 r0 top locked
C15 "82pF" CAPC1608X87N 73.602,71.514 r0 top locked
C16 "82pF" CAPC1608X87N 73.602,76.157 r0 top locked
C17 "82pF" CAPC1608X87N 73.602,80.8 r0 top locked
C18 "330pF" CAPC1608X87N 73.609,93.238 r0 top locked
C19 "330pF" CAPC1608X87N 73.577,88.635 r0 top locked
C20 "100nF" CAPC1005X55N 54.717,88.257 r90 bottom locked
C21 "100nF" CAPC1005X55N 55.717,88.257 r90 bottom locked
C22 "2.2uF" CAPCAF50P125X200X95-8N 50.934,81.832 r180 bottom locked
C23 "100nF" CAPC1005X55N 48.425,81.439 r180 bottom
C24 "100nF" CAPC1005X55N 48.425,82.678 r180 bottom
C25 "2.2uF" CAPC2012X140N 56.834,75.883 r180 bottom locked
C26 "100nF" CAPC1005X55N 53.334,78.8 r270 top locked
C27 "100nF" CAPC1005X55N 52.286,85.36 r90 top locked
C28 "100nF" CAPC1005X55N 54.2,75.606 r270 bottom locked
C29 "100nF" CAPC1005X55N 52.732,87.435 r180 top locked
C30 "100nF" CAPC1005X55N 51.834,77.286 r180 bottom locked
C31 "100nF" CAPC1005X55N 53.75,85.75 r180 top locked
C32 "10uF" CAPC1608X80N 51.981,73.146 r0 top locked
C33 "100nF" CAPC1005X55N 51.668,74.402 r0 bottom locked
C34 "10uF" CAPC1608X80N 58.698,72.693 r90 bottom locked
C35 "100nF" CAPC1005X55N 57.425,73.05 r90 bottom locked
C36 "100nF" CAPC1005X55N 62.141,82.143 r270 bottom locked
C37A "100nF" CAPC1005X55N 36.152,88.405 r270 bottom locked (schematic designator C37)
C37B "100nF" CAPC1005X55N 31.8,77.475 r225 bottom (schematic designator C37)
C38A "100nF" CAPC1005X55N 33.375,90.65 r180 bottom (schematic designator C38)
C38B "100nF" CAPC1005X55N 31.4,80.961 r135 bottom (schematic designator C38)
C39A "6.8pF" CAPC1005X61N 24.14,90.575 r270 top locked (schematic designator C39)
C39B "6.8pF" CAPC1005X61N 28.54,84.95 r270 top locked (schematic designator C39)
C40A "2.2pF" CAPC1608X87N 37.49,92.662 r315 bottom locked (schematic designator C40)
C40B "2.2pF" CAPC1608X87N 35.717,79.496 r270 bottom locked (schematic designator C40)
C41A "100pF" CAPC1005X55N 51.4,90.075 r270 top (schematic designator C41)
C41B "100pF" CAPC1005X55N 48.422,78.855 r270 top (schematic designator C41)
C42A "1pF" CAPC1005X55N 24.125,88.575 r90 top locked (schematic designator C42)
C42B "1pF" CAPC1005X55N 28.525,82.95 r90 top locked (schematic designator C42)
C43A "100pF" CAPC1005X55N 52.33,91.114 r270 top (schematic designator C43)
C43B "100pF" CAPC1005X55N 49.475,79.85 r270 top (schematic designator C43)
C44A "2.2pF" CAPC1608X87N 32.699,87.748 r135 bottom locked (schematic designator C44)
C44B "2.2pF" CAPC1608X87N 28.85,79.4 r90 bottom locked (schematic designator C44)
C45A "100pF" CAPC1005X55N 51.4,92.053 r270 top (schematic designator C45)
C45B "100pF" CAPC1005X55N 48.422,80.833 r270 top (schematic designator C45)
C46A "100nF" CAPC1005X55N 46.04,88.2 r270 bottom (schematic designator C46)
C46B "100nF" CAPC1005X55N 42.789,77.651 r270 bottom (schematic designator C46)
C47A "6.8pF" CAPC1005X61N 24.14,86.625 r90 top locked (schematic designator C47)
C47B "6.8pF" CAPC1005X61N 28.54,81 r90 top locked (schematic designator C47)
C48A "100nF" CAPC1005X55N 48.187,86.717 r180 bottom (schematic designator C48)
C48B "100nF" CAPC1005X55N 44.084,77.686 r270 bottom (schematic designator C48)
C49A "100pF" CAPC1005X55N 47.214,88.341 r270 bottom (schematic designator C49)
C49B "100pF" CAPC1005X55N 45.28,76.247 r180 bottom (schematic designator C49)
C50 "100nF" CAPC1005X55N 113.018,9.32 r0 top
C51A "100nF" CAPC1005X55N 33.371,92.189 r90 bottom locked (schematic designator C51)
C51B "100nF" CAPC1005X55N 32.469,82.074 r45 bottom locked (schematic designator C51)
C52A "100nF" CAPC1005X55N 36.921,90.225 r0 bottom locked (schematic designator C52)
C52B "100nF" CAPC1005X55N 33.55,77.85 r315 bottom (schematic designator C52)
C53 "33pF" CAPC1608X87N 46.537,41.921 r90 top locked
C54 "330pF" CAPC1608X87N 51.066,40.375 r90 top
C55 "33pF" CAPC1608X87N 46.537,38.774 r270 top locked
C56 "100nF" CAPC1005X55N 40.25,40.125 r315 bottom
C57 "100nF" CAPC1005X55N 37.468,42.681 r315 top locked
C58 "100nF" CAPC1005X55N 43.175,42.875 r225 top locked
C59 "100nF" CAPC1005X55N 37.318,38.257 r45 top locked
C60 "100nF" CAPC1005X55N 42.5,43.525 r225 top locked
C61 "33pF" CAPC1608X87N 42.047,34.284 r0 top locked
C62 "330pF" CAPC1608X87N 42.617,31.961 r270 top locked
C63 "33pF" CAPC1608X87N 38.9,34.284 r180 top locked
C64 "100nF" CAPC1005X55N 40.825,40.725 r315 bottom
C65 "100nF" CAPC1005X55N 37.999,37.554 r45 top locked
C66 "100nF" CAPC1005X55N 43.625,37.2 r135 bottom locked
C67 "100nF" CAPC1005X55N 38.14,43.353 r315 top locked
C68 "100nF" CAPC1005X55N 43.626,37.236 r135 top locked
C69 "Undefined" CAPC1608X90N 7.475,63.96 r270 top
C70 "100nF" CAPC1005X55N 7.8,58.475 r0 top
C71 "100nF" CAPC1005X55N 8.84,41.544 r0 top
C72 "Undefined" CAPC1608X90N 7.736,46.09 r270 top
C73 "100nF" CAPC1005X55N 99.187,42.858 r270 bottom
C74 "Undefined" CAPC1608X90N 13.1,29.675 r90 top
C75 "100nF" CAPC1005X55N 18.374,14.99 r0 bottom
C76 "Undefined" CAPC1608X90N 8.475,6.725 r0 top
C77 "100nF" CAPC1005X55N 18.009,24.036 r180 bottom
C78 "100nF" CAPC1005X55N 103.175,28.706 r45 bottom locked
C79 "100nF" CAPC1005X55N 107.721,23.401 r225 bottom locked
C80 "100nF" CAPC1005X55N 103.399,23.083 r135 bottom locked
C81 "220uF" CAPAE830X620N 146.5,8.45 r270 top
C82 "Undefined" CAPC1608X90N 12.79,95.575 r0 top locked
C83 "Undefined" CAPC1608X90N 8.575,4.85 r0 top
C84 "1uF" CAPC1005X55N 80.596,85.658 r270 bottom locked
C85 "1uF" CAPC1005X55N 81.098,76.469 r90 bottom locked
C86 "10uF" CAPC1608X80N 83.348,75.894 r90 bottom locked
C87 "100nF" CAPC1005X55N 82.096,76.484 r90 bottom locked
C88 "100nF" CAPC1005X55N 85.378,79.994 r180 bottom locked
C89 "10uF" CAPC1608X80N 84.923,76.234 r90 bottom locked
C90 "100nF" CAPC1005X55N 85.378,79.043 r180 bottom locked
C91 "10uF" CAPC1608X80N 111.563,51.275 r180 top locked
C92 "100nF" CAPC1005X55N 111.275,52.539 r180 top locked
C93 "10uF" CAPC1608X80N 102.125,53.655 r270 top locked
C94 "100nF" CAPC1005X55N 104.125,53.988 r270 bottom locked
C97 "100nF" CAPC1005X55N 106.563,52.539 r180 top locked
C98 "100nF" CAPC1005X55N 145.215,23.525 r0 top
C99 "1uF" CAPC1005X55N 35.703,55.796 r0 top locked
C100 "10uF" CAPMP3216X180N 36.603,55.207 r0 bottom locked
C101 "10uF" CAPMP3216X180N 36.705,62.373 r180 bottom locked
C102 "1uF" CAPC1005X55N 36.585,63.369 r180 top
C103 "2.2uF" CAPC2012X140N 116.35,4.995 r270 top
C104 "2.2uF" CAPC2012X140N 110.6,6.37 r270 top
C105 "10uF" CAPC1608X80N 120.518,26.401 r90 top
C106 "22uF" CAPC2012X135N 114.191,25.573 r180 top
C107 "22uF" CAPC2012X135N 124.56,23.878 r180 top
C108 "22uF" CAPC2012X135N 33.231,56.618 r90 bottom locked
C109 "10uF" CAPMP3216X180N 32.875,55.225 r270 top locked
C110 "22uF" CAPMP3216X180N 32.388,60.762 r0 bottom locked
C111 "22uF" CAPC2012X135N 129.1,51.047 r180 top
C112 "22uF" CAPC2012X135N 128.775,59.197 r180 top
C114 "1.5nF" CAPC1005X55N 118.987,3.793 r270 top
C115 "100nF" CAPC1005X55N 122.407,9.62 r0 top
C116 "22uF" CAPC2012X135N 124.807,4.345 r180 top
C117 "100nF" CAPC1005X55N 124.957,5.845 r180 top
C118 "22uF" CAPC2012X135N 127.657,12.97 r90 top
C119 "22uF" CAPC2012X135N 125.732,13.02 r90 top
C120 "22uF" CAPC2012X135N 113.525,58.229 r270 top locked
C121 "100nF" CAPC1005X55N 115.475,58.148 r270 top locked
C122 "4.7nF" CAPC3216X140N 52.693,6.891 r180 bottom locked
C123 "4.7nF" CAPC3216X140N 46.282,6.997 r90 bottom locked
C124 "220uF" CAPAE830X620N 145.85,52.254 r270 top
C125 "220uF" CAPAE830X620N 135.8,67.125 r90 top
C126 "22uF" CAPC2012X135N 50.254,11.752 r90 bottom locked
C127 "4.7nF" CAPC3216X140N 52.146,4.547 r180 bottom locked
C128 "10uF" CAPC1608X80N 92.675,31.6 r180 top locked
C129 "100nF" CAPC1005X55N 108.975,27.716 r0 bottom locked
C130 "10uF" CAPC1608X80N 93.246,73.009 r180 top locked
C131 "10uF" CAPC1608X80N 93.375,63 r270 top locked
C132 "10uF" CAPC1608X80N 95.775,63 r270 top locked
C133 "4.7uF" CAPC1709X95N 59.458,63.869 r0 top locked
C134 "22uF" CAPC2012X135N 63.595,53.149 r90 bottom locked
C135 "10uF" CAPMP3216X180N 61.028,53.353 r270 bottom locked
C136 "22uF" CAPMP3216X180N 57.923,52.692 r270 bottom locked
C137 "1uF" CAPC1005X55N 41.174,55.561 r0 top locked
C138 "10uF" CAPMP3216X180N 41.975,55.55 r0 bottom locked
C139 "10uF" CAPMP3216X180N 42.049,62.995 r180 bottom locked
C140 "1uF" CAPC1005X55N 40.499,60.21 r90 bottom locked
C141 "4.7uF" CAPC1709X95N 53.957,63.888 r0 top locked
C142 "22uF" CAPC2012X135N 55.775,58.449 r270 bottom locked
C143 "10uF" CAPMP3216X180N 55.463,53.353 r270 bottom locked
C144 "22uF" CAPMP3216X180N 52.422,52.692 r270 bottom locked
C145 "4.7uF" CAPC1709X95N 48.132,63.888 r0 top locked
C146 "22uF" CAPC2012X135N 49.825,58.5 r270 bottom locked
C147 "10uF" CAPMP3216X180N 49.595,53.353 r270 bottom locked
C148 "22uF" CAPMP3216X180N 46.584,52.692 r270 bottom locked
C149 "1uF" CAPC1005X55N 56.545,40.034 r90 bottom locked
C150 "1uF" CAPC1005X55N 57.5,40.035 r90 bottom locked
C151 "1uF" CAPC1005X55N 62.725,42.375 r90 bottom locked
C152 "1uF" CAPC1005X55N 60.675,45.8 r0 top
C153 "1uF" CAPC1005X55N 60.825,49.575 r180 bottom locked
C154 "1uF" CAPC1005X55N 60.005,42.048 r270 top locked
C155 "22uF" CAPMP3216X180N 55.825,50.65 r90 top locked
C156 "1uF" CAPC1005X55N 51.8,48.75 r270 top locked
C157 "1uF" CAPC1005X55N 52.825,48.75 r270 top locked
C158 "100nF" CAPC1005X55N 57.659,51.699 r270 top locked
C159 "100nF" CAPC1005X55N 55.59,40.034 r90 bottom locked
C160 "100nF" CAPC1005X55N 60.675,44.625 r0 top
C161 "100nF" CAPC1005X55N 61.285,49.51 r270 top locked
C162 "22uF" CAPMP3216X180N 48.312,48.754 r180 top locked
C163 "22uF" CAPC2012X135N 101.1,80 r270 bottom locked
C164 "22uF" CAPC2012X135N 98.5,86.729 r270 bottom locked
C165 "10uF" CAPMP3216X180N 95.79,86.81 r90 bottom locked
C166 "10uF" CAPMP3216X180N 99.592,81.411 r0 top locked
C167 "22uF" CAPC2012X135N 117.574,79.899 r270 bottom locked
C168 "22uF" CAPC2012X135N 108.078,78.555 r270 bottom locked
C169 "10uF" CAPMP3216X180N 105.672,78.58 r90 bottom locked
C170 "1uF" CAPC1005X55N 102.975,79.994 r270 bottom locked
C171 "10uF" CAPMP3216X180N 140.971,73.892 r270 top
C172 "22uF" CAPC2012X135N 140,78.3 r270 top locked
C173 "22uF" CAPC2012X135N 145.85,78.3 r270 top
C174 "22uF" CAPC2012X135N 141.935,78.3 r270 top locked
C175 "22uF" CAPC2012X135N 144,78.3 r270 top locked
C176 "22uF" CAPC2012X135N 142.135,69.916 r0 top
C177 "22uF" CAPC2012X135N 117.975,91.657 r90 bottom locked
C178 "22uF" CAPC2012X135N 108.078,90.416 r90 bottom locked
C179 "10uF" CAPMP3216X180N 105.672,90.569 r90 bottom locked
C180 "1uF" CAPC1005X55N 100.75,90.75 r90 bottom locked
C181 "10uF" CAPMP3216X180N 102.719,90.547 r90 bottom locked
C182 "10uF" CAPMP3216X180N 94.122,94.262 r90 bottom locked
C183 "1uF" CAPC1005X55N 92.098,94.262 r90 bottom locked
C184 "1.5nF" CAPC1005X55N 117.218,21.452 r90 top
C185 "1.5nF" CAPC1005X55N 119.494,21.219 r90 top
C186 "150pF" CAPC1005X55N 118.469,21.172 r90 top
C187 "10uF" CAPC1608X80N 130.785,25.103 r90 top
C188 "150pF" CAPC1005X55N 109.15,38.075 r180 bottom
C189 "100nF" CAPC1005X55N 95.37,43.775 r0 bottom
C190 "100nF" CAPC1005X55N 13.2,59.794 r270 bottom
C191 "100nF" CAPC1005X55N 13.8,44.65 r270 bottom
C192 "22uF" CAPC2012X135N 116.35,8.645 r270 top
C193 "22uF" CAPC2012X135N 118.3,8.645 r270 top
C194 "1.5nF" CAPC1005X55N 127.485,19.761 r90 top
C195 "1.5nF" CAPC1005X55N 129.81,19.533 r90 top
C196 "150pF" CAPC1005X55N 128.78,19.533 r90 top
C197 "4.7uF" CAPC1709X95N 31.553,66.849 r0 top locked
C198 "150pF" CAPC1005X55N 130.815,7.47 r0 top
C199 "22uF" CAPC2012X135N 128.775,61.096 r180 top
C200 "33pF" CAPC1608X87N 125.273,54.026 r0 top
C201 "1.5nF" CAPC1005X55N 117.737,3.793 r270 top
C202 "100nF" CAPC1005X55N 53.253,40.035 r0 bottom
C203 "100nF" CAPC1005X55N 53.197,41.134 r0 bottom
C204 "100nF" CAPC1005X55N 102.441,51.24 r180 top
C205 "100nF" CAPC1005X55N 26.395,75.252 r0 bottom
D1 "BAV199" SOT95P240X110-3N 73.934,59.134 r180 bottom locked
D2 "BAV199" SOT95P240X110-3N 73.934,64.084 r180 bottom locked
D3 "BAV199" SOT95P240X110-3N 73.934,70.119 r180 bottom locked
D4 "BAV199" SOT95P240X110-3N 73.934,74.025 r180 bottom locked
D5 "BAV199" SOT95P240X110-3N 73.934,77.934 r180 bottom locked
D6 "BAV199" SOT95P240X110-3N 73.934,83.484 r180 bottom locked
D7 "BAV199" SOT95P240X110-3N 73.934,91.285 r180 bottom locked
D8 "BAV199" SOT95P240X110-3N 73.934,87.135 r180 bottom locked
D9 "BAV199" SOT95P240X110-3N 33.03,50.621 r270 top locked
D10 "BAV199" SOT95P240X110-3N 33.03,46.671 r90 top locked
D11 "BAV199" SOT95P240X110-3N 33.025,42.325 r270 top locked
D12 "BAV199" SOT95P240X110-3N 33.025,38.375 r90 top locked
D13 "NUP4114UPXV6T1G" SOTFL50P160X60-6N 98.532,41.112 r0 bottom
D14 "PMEG6020ER" SODFL3517X110N 15.812,6.55 r90 top
D15 "PMEG6020ER" SODFL3517X110N 12.55,6.575 r90 top
D16 "NUP4114UPXV6T1G" SOTFL50P160X60-6N 95.37,42.297 r180 bottom
D17 "NUP4114UPXV6T1G" SOTFL50P160X60-6N 7.551,20.117 r270 bottom
D18 "SMBJ60A" DIOM5336X265N 48.488,17.845 r0 top locked
D19 "PMEG6020ER" SODFL3517X110N 15.824,6.85 r270 bottom
D20 "PMEG6020ER" SODFL3517X110N 12.55,6.85 r270 bottom
D21 "NUP4114UPXV6T1G" SOTFL50P160X60-6N 145.265,25.651 r90 top
D22 "NUP4114UPXV6T1G" SOTFL50P160X60-6N 9.46,52.836 r90 bottom
D23 "SMBJ15A" DIOM5336X265N 146.7,18.225 r90 top
D24 "PMEG6020ER" SODFL3517X110N 36.453,61.825 r180 top
D25 "SMBJ5.0A" DIOM5336X265N 107.153,12.5 r90 top
D26 "PMEG6020ER" SODFL3517X110N 142.9,24.7 r90 top
D27 "PMEG6020ER" SODFL3517X110N 41.75,63 r180 top locked
D28 "PMEG6020ER" SODFL3517X110N 93.978,79.739 r270 top
D29 "PMEG6020ER" SODFL3517X110N 96.242,92.747 r90 top locked
D30 "PMEG6020ER" SODFL3517X110N 24.836,32.2 r0 bottom
D31 "PMEG6020ER" SODFL3517X110N 94.56,28.802 r180 top
D32 "PMEG6020ER" SODFL3517X110N 38.425,72.29 r0 bottom
FL1 "10A/50VDC" FIL_MURATA_BNX02 153.171,70.025 r270 top
FTG1 "Use only in PCB" FIDUCIAL_TOP_C100-200 152.25,4.3 r90 top
FTG2 "Use only in PCB" FIDUCIAL_TOP_S100-200 23.104,4.143 r90 bottom
FTG3 "Use only in PCB" FIDUCIAL_TOP_S100-200 9.519,94.975 r90 top locked
FTG4 "Use only in PCB" FIDUCIAL_TOP_S100-200 132.4,95.325 r90 bottom
IC1 "TPS2051BDGN" SOP65P490X110-9N-R157X189 18.443,28.581 r180 bottom locked
IC2 "LTC2195CUKG" QFN50P700X800X80-53N-R655X550 56.734,81.839 r0 bottom locked
IC3 "ADA4930-2YCPZ" QFN50P400X400X80-25N-S240 40.471,40.35 r135 top locked
IC4 "74LVC1G125W5-7" SOT95P280X145-5N 10.998,59.425 r180 top
IC5 "74LVC1G14GW" SOT65P212X110-5N 10.745,60.134 r0 bottom
IC6 "TXS02612RTWR" QFN50P400X400X80-25N-S255 105.45,26.125 r315 bottom locked
IC7 "24AA02E48T-I/OT" SOT95P280X145-5N 148.175,24.825 r270 top
IC8 "LT1964ES5-SD#TRMPBF" SOT95P280X100-5N 36.653,58.745 r90 top locked
IC9 "LT3042EMSE#PBF" SOP50P490X110-11N-R168X198 31.745,62.649 r270 top locked
IC10 "MPM3840GQV" MPS_MPM38XXGQV 128.825,55.122 r180 top
IC11 "TPS56637RPA" TEXAS_RPA0010A 125.477,8.22 r180 top
IC12 "AG5300/AG5412" SILVERTEL_AG5300 139.2,33.831 r90 top locked
IC13 "TCMD1000" SOIC127P700X242-4N 56.619,16.653 r270 top locked
IC14 "TCMD1000" SOIC127P700X242-4N 60.016,16.653 r90 top locked
IC15 "MAX17577ATC+" SON50P300X300X80-13N-R180X260 113.425,6.37 r90 top
IC16 "LT3045EDD#PBF" SON50P300X300X80-11N-R175X248 59.455,59.067 r270 top locked
IC17 "LT1964ES5-SD#TRMPBF" SOT95P280X100-5N 41.724,59.185 r90 top locked
IC18 "LT3045EDD#PBF" SON50P300X300X80-11N-R175X248 53.957,58.843 r270 top locked
IC19 "LT3042EMSE#PBF" SOP50P490X110-11N-R168X198 48.132,59.742 r270 top locked
IC20 "SI5340B-D-GM" QFN50P700X700X90-45N-S530 57.5,45.125 r0 bottom locked
IC21 "LT3042EMSE#PBF" SOP50P490X110-11N-R168X198 98.5,79.2 r90 bottom locked
IC22 "CC6-1212DF-E" CC6-1212DF-E 135.07,74.646 r180 top locked
IC23 "LT1964ES5-SD#TRMPBF" SOT95P280X100-5N 99.65,94.794 r180 bottom locked
IC24 "FAN8060EMPX" SON50P300X80_HS-11N 117.862,24.578 r270 top
IC25 "FAN8060EMPX" SON50P300X80_HS-11N 128.155,22.893 r270 top
IC26 "ADR130AUJZ-R2" ADI-UJ-6_N 50.607,22.851 r0 top locked
IC27A "LTC6406IMS8E#PBF" LT-MS8E-8-EDP_M 46.299,90.162 r90 top (schematic designator IC27)
IC27B "LTC6406IMS8E#PBF" LT-MS8E-8-EDP_M 43.438,79.687 r90 top (schematic designator IC27)
IC28A "ADA4817-2ACPZ-R7" CP-16-4_N 35.177,90.312 r270 top locked (schematic designator IC28)
IC28B "ADA4817-2ACPZ-R7" CP-16-4_N 32.419,79.47 r225 top locked (schematic designator IC28)
IC29 "74LVC1G125W5-7" SOT95P280X145-5N 11.395,44.47 r180 top
IC30 "74LVC1G14GW" SOT65P212X110-5N 11.395,44.865 r0 bottom
IC31 "AD9117BCPZ" CP-40-1_N 56.351,29.805 r180 top locked
IC32 "ADR127AUJZ-REEL7" ADI-UJ-6_M 54.85,72.575 r0 bottom locked
IC33 "AD7266BCPZ" CP-32-2_N 80.846,81.048 r90 bottom locked
IC34 "AD5722RBREZ" RE-24_N 107.225,57.055 r270 top locked
IC36 "LM75AIMM/NOPB" SOP65P490X109-8N 98.016,50.49 r0 top
IC37 "LM75AIMM/NOPB" SOP65P490X109-8N 30.535,73.499 r180 bottom
J1 "USB" UJ2-MIBH-4-MSMT -1.5,18.895 r270 bottom locked
J2 "" 3M_N2530-6002RB 154.384,38.018 r270 top locked
J3 "Header 26" 3M_N2526-6002RB 67,76 r90 top locked
J4 "Header 34" 3M_N2534-6002RB 67,29 r90 top locked
J5 "MCX" AMPHENOL_919-383J-51A 1.75,61 r180 top locked
J6 "MCX" AMPHENOL_919-383J-51A 1.75,44 r180 top locked
J7 "RJ45" BEL_0826-1X1T-80-F 22.48,18.885 r90 top locked
J8 "microSD" ATTEND_112A-TAAR-R03 101.95,8.6 r180 bottom locked
J9 "Jack" SWITCHCRAFT_L712RA 145.617,84.9 r180 top locked
J10 "MRX56904CV" MRX56904CV 147.971,87.016 r90 top
J11 "MMCX" SAMTEC_MMCX-J-P-H-ST-TH1 40.951,50.199 r0 top
J15 "SMA" DELOCK_65848 4.54,52.5 r180 top locked
J16 "Header 16" 3M_N2516-6002RB 23,51 r270 top locked
J17 "Milli-Grid™" MOLEX_87832-1420 85.422,92.405 r180 top locked
J18 "SMA" DELOCK_65848 4.54,86.5 r180 top
J19 "SMA" DELOCK_65848 4.54,35.5 r180 top locked
J20 "SMA" DELOCK_65848 4.54,69.5 r180 top locked
JB1 "LSHM-150-04.0-L-DV-A-S-K-TR" LSHM-150-XXX-X-DV-A-X 105.725,36.554 r0 top locked
JB2 "LSHM-150-04.0-L-DV-A-S-K-TR" LSHM-150-XXX-X-DV-A-X 105.725,68.554 r0 top locked
JB3 "LSHM-130-04.0-L-DV-A-S-K-TR" LSHM-130-04.0-X-DV-A-S-K-TR 84.725,52.555 r90 top
L1 "60@100MHz" IND_WURTH_WE-CNSW_0504 10.29,18.32 r270 bottom
L2A "360R@100MHz" IND_TDK_ACM2012 15.375,78.17 r90 top locked (schematic designator L2)
L2B "360R@100MHz" IND_TDK_ACM2012 23.428,78.833 r135 top locked (schematic designator L2)
L3 "360R@100MHz" IND_TDK_ACM2012 29.697,48.636 r180 top locked
L4 "360R@100MHz" IND_TDK_ACM2012 29.675,40.35 r180 top locked
L5 "10uH" IND_TDK_VLCF5020-1 113.175,12.8 r90 top
L6 "3.3uH" INDM6965X300N 120.882,14.495 r90 top
L7 "3.3uH" IND_WURTH_WE-TPC_4828 119.6,56.061 r180 top
L8 "10uH" IND_MURATA-PS_8400 46.279,13.056 r270 top locked
L9 "2x1mH" IND_WURTH_WE-SL2 48.87,5.974 r0 top locked
L10 "10uH" IND_MURATA-PS_8400 110.325,77.401 r180 top locked
L11 "10uH" IND_MURATA-PS_8400 104.176,77.401 r180 top locked
L12 "10uH" IND_MURATA-PS_8400 144.367,73.762 r90 top
L13 "10uH" IND_MURATA-PS_8400 110.325,92.516 r180 top locked
L14 "10uH" IND_MURATA-PS_8400 104.176,92.516 r180 top locked
L15 "3.3uH" IND_WURTH_WE-TPC_4828 114.943,29.701 r180 top
L16 "3.3uH" IND_WURTH_WE-TPC_4828 125.21,28.003 r180 top
L17 "330R@100MHz" INDC1608X75N 47.787,65.276 r0 top
L18 "330R@100MHz" INDC1608X75N 36.741,52.459 r90 top
L19 "330R@100MHz" INDC1608X75N 41.711,54.317 r180 top
L20 "330R@100MHz" INDC1608X75N 54.155,65.276 r0 top
L21 "330R@100MHz" INDC1608X75N 59.539,65.18 r0 top
L22 "330R@100MHz" INDC1608X75N 31.553,68.32 r0 top
LD1 "Red/Green" LED_DIALIGHT_571-0112F#1 2.5,28.95 r0 top
LD2 "Red/Green" LED_DIALIGHT_571-0112F#2 2.5,76.5 r0 top locked
LD3 "Green/Green" LED_DIALIGHT_571-0122F 2.5,79.5 r0 top locked
LD4 "Green" LED_KINGBRIGHT_KPH-1608CGCK 75,5.2 r90 top locked
LD5 "Green" LED_KINGBRIGHT_KPH-1608CGCK 59.438,66.64 r180 top locked
LD6 "Green" LED_KINGBRIGHT_KPH-1608CGCK 32.077,70.045 r180 top locked
LD7 "Green" LED_KINGBRIGHT_KPH-1608CGCK 48.038,66.539 r180 top locked
LD8 "Green" LED_KINGBRIGHT_KPH-1608CGCK 88.545,5.205 r90 top locked
LD9 "Green" LED_KINGBRIGHT_KPH-1608CGCK 78.614,5.221 r270 top locked
LD10 "Green" LED_KINGBRIGHT_KPH-1608CGCK 93.191,5.205 r90 top locked
LD11 "Green" LED_KINGBRIGHT_KPH-1608CGCK 36.378,66.201 r0 top locked
LD12 "Green" LED_KINGBRIGHT_KPH-1608CGCK 53.834,66.539 r180 top locked
LD13 "Green" LED_KINGBRIGHT_KPH-1608CGCK 41.999,66.231 r180 top locked
LD14 "Green" LED_KINGBRIGHT_KPH-1608CGCK 85.02,5.199 r90 top locked
LD15 "Green" LED_KINGBRIGHT_KPH-1608CGCK 81.994,5.199 r90 top locked
LD16 "Green" LED_KINGBRIGHT_KPH-1608CGCK 96.665,23.276 r180 top locked
LD17 "Green" LED_KINGBRIGHT_KPH-1608CGCK 96.665,24.504 r180 top locked
LD18 "Green" LED_KINGBRIGHT_KPH-1608CGCK 96.665,25.732 r180 top locked
LD19 "Green" LED_KINGBRIGHT_KPH-1608CGCK 96.665,26.96 r180 top locked
LD20 "Green" LED_KINGBRIGHT_KPH-1608CGCK 86.182,14.656 r0 top
OSC1 "100MHz" OSC_CDFN3225-4LD-PL-1 109.02,30.156 r180 top
PB1 "Push Button" PB_TYCO_FSM6JSMA 81.685,80.668 r0 top locked
Q1 "48MHz" XTAL_TXC_7M 50.925,44.775 r270 bottom locked
R1 "1k" RESC1005X40N 14.877,28.681 r270 bottom locked
R2 "DNP" RESC1005X40N 127.907,28.82 r180 bottom value=2k4
R3 "DNP" RESC1005X40N 127.907,31.681 r180 bottom value=2k4
R4 "0" RESC1005X40N 7,15.275 r180 bottom
R5 "0" RESC1005X40N 7.025,16.275 r180 bottom
R6 "1M" RESC1005X40N 7.075,22.275 r0 bottom
R7 "0" RESC1005X40N 51.381,28.714 r90 top locked
R8 "20" RESC1608X55N 52.568,28.553 r180 bottom locked
R9 "20" RESC1608X55N 52.568,27.017 r180 bottom locked
R10 "0" RESC1005X40N 51.376,26.86 r270 top locked
R11 "0" RESC1005X40N 51.376,30.755 r270 top locked
R12 "0" RESC1005X40N 51.376,32.605 r90 top locked
R13 "20" RESC1608X55N 52.594,30.94 r180 bottom locked
R14 "20" RESC1608X55N 52.594,32.453 r180 bottom locked
R15 "0" RESC1005X40N 55.676,26.53 r270 bottom locked
R16 "0" RESC1005X40N 56.626,26.53 r270 bottom locked
R17 "0" RESC1005X40N 54.726,33.08 r270 bottom locked
R18 "0" RESC1005X40N 54.701,26.517 r90 bottom locked
R19 "0" RESC1005X40N 54.601,21.872 r0 top locked
R20 "10k" RESC1005X40N 56.1,22.375 r90 top locked
R21 "0" RESC1005X40N 45.58,22.155 r270 top
R22 "49R9" RESC1005X40N 106.555,51.522 r0 top
R23 "1k" RESC1005X40N 73.634,59.134 r180 top locked
R24 "1k" RESC1005X40N 73.602,60.68 r180 top locked
R25 "1k" RESC1005X40N 73.659,63.809 r180 top locked
R26 "1k" RESC1005X40N 73.602,65.323 r180 top locked
R27 "1k" RESC1005X40N 73.602,68.418 r180 top locked
R28 "1k" RESC1005X40N 73.602,69.966 r180 top locked
R29 "1k" RESC1005X40N 73.602,73.062 r180 top locked
R30 "1k" RESC1005X40N 73.602,74.609 r180 top locked
R31 "1k" RESC1005X40N 73.602,77.705 r180 top locked
R32 "1k" RESC1005X40N 73.602,79.252 r180 top locked
R33 "1k" RESC1005X40N 73.602,82.348 r180 top locked
R34 "1k" RESC1005X40N 73.602,83.895 r180 top locked
R35 "220" RESC1608X55N 73.577,87.115 r180 top locked
R36 "220" RESC1608X55N 73.577,85.594 r180 top locked
R37 "220" RESC1608X55N 73.609,91.7 r180 top locked
R38 "220" RESC1608X55N 73.609,90.162 r180 top locked
R39 "0" RESC1005X40N 55.525,74.625 r180 bottom
R40A "220" RESC1608X55N 45.964,85.611 r180 bottom locked (schematic designator R40)
R40B "220" RESC1608X55N 42.986,74.391 r180 bottom locked (schematic designator R40)
R41A "249" RESC1608X55N 46.399,94.721 r0 top (schematic designator R41)
R41B "249" RESC1608X55N 43.363,84.165 r0 top (schematic designator R41)
R42A "1k82" RESC1608X55N 21.35,89.375 r0 top (schematic designator R42)
R42B "1k82" RESC1608X55N 25.675,83.7 r0 top (schematic designator R42)
R43A "249" RESC1608X55N 46.299,85.594 r0 top (schematic designator R43)
R43B "249" RESC1608X55N 43.5,74.875 r0 top (schematic designator R43)
R44A "50" RESC1005X35N 36.589,91.76 r315 bottom locked (schematic designator R44)
R44B "50" RESC1005X35N 34.442,79.496 r270 bottom locked (schematic designator R44)
R45A "31R6" RESC1608X55N 39.423,89.025 r0 top (schematic designator R45)
R45B "31R6" RESC1608X55N 36.727,76.776 r0 top (schematic designator R45)
R46A "340" RESC1608X55N 43.224,89.375 r0 top (schematic designator R46)
R46B "340" RESC1608X55N 40.1,78.48 r0 top (schematic designator R46)
R47A "0" RESC1005X40N 53.685,90.637 r0 top (schematic designator R47)
R47B "0" RESC1005X40N 50.965,79.377 r0 top (schematic designator R47)
R48A "200" RESC1608X55N 34.621,92.614 r90 bottom locked (schematic designator R48)
R48B "200" RESC1608X55N 33.654,81.491 r45 bottom locked (schematic designator R48)
R49A "0" RESC1005X40N 13.2,77.245 r0 top locked (schematic designator R49)
R49B "0" RESC1005X40N 22.125,77.245 r0 top locked (schematic designator R49)
R50A "31R6" RESC1608X55N 39.65,91.975 r0 top (schematic designator R50)
R50B "31R6" RESC1608X55N 36.44,82.48 r0 top (schematic designator R50)
R51A "340" RESC1608X55N 43.163,91.412 r0 top (schematic designator R51)
R51B "340" RESC1608X55N 40.1,80.34 r0 top (schematic designator R51)
R52A "0" RESC1005X40N 53.685,91.595 r0 top (schematic designator R52)
R52B "0" RESC1005X40N 50.965,80.334 r0 top (schematic designator R52)
R53A "10k" RESC1005X40N 117.451,69.885 r90 bottom locked (schematic designator R53)
R53B "10k" RESC1005X40N 116.455,69.885 r90 bottom locked (schematic designator R53)
R54A "49R9" RESC6331X70N 15.245,70.5 r270 bottom locked (schematic designator R54)
R54B "49R9" RESC6331X70N 23.704,70.5 r270 bottom locked (schematic designator R54)
R55A "50" RESC1005X35N 33.671,88.737 r135 bottom locked (schematic designator R55)
R55B "50" RESC1005X35N 30.241,79.421 r90 bottom locked (schematic designator R55)
R56A "1k82" RESC1608X55N 21.35,87.8 r0 top (schematic designator R56)
R56B "1k82" RESC1608X55N 25.675,82.2 r0 top (schematic designator R56)
R57A "0" RESC1005X40N 17.65,77.275 r180 top locked (schematic designator R57)
R57B "0" RESC1005X40N 26.575,77.275 r180 top locked (schematic designator R57)
R58A "220" RESC1608X55N 45.374,94.775 r90 bottom locked (schematic designator R58)
R58B "220" RESC1608X55N 40,83.62 r90 bottom (schematic designator R58)
R59 "499" RESC1608X55N 44.999,41.868 r90 top locked
R60 "0" RESC1005X40N 29.728,50.246 r180 top locked
R61 "348" RESC1608X55N 48.835,41.143 r180 top locked
R62 "0" RESC1005X40N 34.719,49.128 r180 top locked
R63 "0" RESC1005X40N 41.649,42.235 r45 bottom
R64 "0" RESC1005X40N 34.719,48.171 r180 top locked
R65 "348" RESC1608X55N 48.835,39.587 r180 top locked
R66 "0" RESC1005X40N 29.728,46.946 r180 top locked
R67 "499" RESC1608X55N 44.999,38.827 r270 top locked
R68 "10k" RESC1005X40N 98.975,64.237 r270 bottom locked
R69 "499" RESC1608X55N 41.994,35.822 r0 top locked
R70 "0" RESC1005X40N 29.675,42.025 r180 top locked
R71 "348" RESC1608X55N 41.234,31.986 r90 top locked
R72 "0" RESC1005X40N 34.7,40.825 r180 top locked
R73 "0" RESC1005X40N 37.969,40.034 r135 bottom locked
R74 "0" RESC1005X40N 34.7,39.875 r180 top locked
R75 "348" RESC1608X55N 39.696,32.004 r90 top locked
R76 "0" RESC1005X40N 29.675,38.7 r180 top locked
R77 "499" RESC1608X55N 38.953,35.822 r180 top locked
R78 "10k" RESC1005X40N 99.987,64.237 r270 bottom locked
R79 "49R9" RESC1005X40N 7.736,60.05 r0 top
R80 "49R9" RESC1005X40N 7.35,61.474 r270 top
R81 "49R9" RESC1005X40N 13.775,59.025 r270 top
R82 "49R9" RESC1005X40N 6.325,44.65 r270 top
R83 "10k" RESC1005X40N 6.24,60.244 r270 top
R84 "10k" RESC1005X40N 10.925,57.075 r180 top
R85 "340" RESC1608X55N 30.378,14.965 r180 bottom
R86 "0" RESC1005X40N 8.875,8.3 r180 top
R87 "49R9" RESC1005X40N 12.816,61.809 r0 bottom
R88 "49R9" RESC1005X40N 8.026,44.084 r0 top
R89 "49R9" RESC1005X40N 14.55,44 r270 top
R90 "10k" RESC1005X40N 10.645,42.025 r180 top
R91 "340" RESC1608X55N 29.825,24.9 r180 bottom
R92 "10k" RESC1005X40N 8.026,43.05 r0 top
R93 "49R9" RESC1005X40N 12.848,46.84 r0 bottom
R94 "33" RESC1005X40N 32.795,24.475 r180 bottom
R95 "33" RESC1005X40N 32.795,23.505 r180 bottom
R96 "220" RESC1608X55N 9.425,31.975 r90 top
R97 "220" RESC1608X55N 10.97,31.975 r90 top
R98 "220" RESC1608X55N 4.8,74.261 r0 top
R99 "220" RESC1608X55N 8.55,74.225 r0 top
R100 "10k" RESC1005X40N 112.693,69.885 r90 bottom locked
R101 "220" RESC1608X55N 10.498,84.699 r90 top locked
R102 "10k" RESC1005X40N 111.8,69.885 r90 bottom locked
R103 "220" RESC1608X55N 13.091,84.655 r90 top locked
R104 "1k" RESC1005X40N 75,7.637 r90 top locked
R105 "1k" RESC1005X40N 59.305,66.64 r0 bottom locked
R106 "220" RESC1608X55N 32.388,69.931 r0 bottom locked
R107 "10k" RESC1005X40N 88.545,7.592 r90 top locked
R108 "2k4" RESC1005X40N 48.038,66.539 r180 bottom locked
R109 "2k4" RESC1005X40N 78.601,7.592 r90 top locked
R110 "1k" RESC1005X40N 93.189,7.592 r270 top locked
R111 "220" RESC1608X55N 36.503,66.129 r0 bottom locked
R112 "1k" RESC1005X40N 53.834,66.539 r180 bottom locked
R113 "2k4" RESC1005X40N 41.999,66.231 r180 bottom locked
R114 "2k4" RESC1005X40N 85.02,7.592 r270 top locked
R115 "1k" RESC1005X40N 81.994,7.592 r270 top locked
R116 "0" RESC1005X40N 12.79,93.8 r180 top locked
R117 "0" RESC1005X40N 8.824,4.85 r180 bottom
R118 "33" RESC1005X40N 85.448,81.794 r180 bottom locked
R119 "10k" RESC1005X40N 81.573,85.669 r270 bottom locked
R120 "10k" RESC1005X40N 104.752,62.529 r90 top locked
R121 "10k" RESC1005X40N 113.179,61.122 r270 top locked
R122 "10k" RESC1005X40N 103.38,62.529 r90 top locked
R123 "200k" RESC1005X40N 130.434,27.689 r180 bottom
R124 "200k" RESC1005X40N 130.685,30.081 r180 bottom
R125 "10k" RESC1005X40N 37.739,55.35 r90 top locked
R126 "39k" RESC1005X40N 36.528,58.611 r180 bottom locked
R127 "36k" RESC1005X40N 36.528,60.095 r0 bottom locked
R128 "10k" RESC1005X40N 125.22,51.617 r270 top
R129 "10k" RESC1005X40N 126.275,51.702 r270 top
R130 "39k" RESC1005X40N 118.402,6.5 r0 top
R131 "62k" RESC1005X40N 125.575,55.322 r0 top
R132 "10k" RESC1005X40N 113.198,23.803 r180 top
R133 "1k" RESC1005X40N 88.659,14.783 r180 top
R134 "24k9" RESC1608X55N 31.258,56.988 r90 bottom locked
R135 "270k" RESC1005X40N 125.825,56.747 r90 top
R136 "10k" RESC1005X40N 127.907,51.572 r90 bottom
R137 "0" RESC1005X40N 118.862,27.878 r270 bottom
R138 "10k" RESC1005X40N 128.655,6.37 r270 bottom
R139 "0" RESC3116X80N 125.232,17.7 r90 top
R140 "10k" RESC1005X40N 130.027,14.395 r270 top
R141 "20k" RESC1005X40N 130.815,8.817 r180 top
R142 "10k" RESC1005X40N 127.96,8.372 r270 top
R143 "0" RESC1005X40N 128.507,9.92 r180 top
R144 "82k" RESC1608X55N 46.431,14.503 r180 bottom locked
R145 "0" RESC1005X40N 52.85,10.425 r180 top locked
R146 "220" RESC1608X55N 58.894,21.38 r0 bottom locked
R147 "Undefined" RESC1608X55N 53.001,11.76 r180 top locked